# Altium PCB DB30.PcbDoc (part 1 of 8)
Units mil, origin at the board's own origin, x right, y up, seen from the top; angles counter-clockwise.
Board outline 3236.22 x 4456.69 mil, 8 copper layers (Top Layer, MidLayer1, MidLayer2, GND-Layer5, MidLayer3, VCC, MidLayer4, Bottom Layer), stack 61.8 mil thick; 219 components, 472 nets, 1811 pads, 1561 vias.
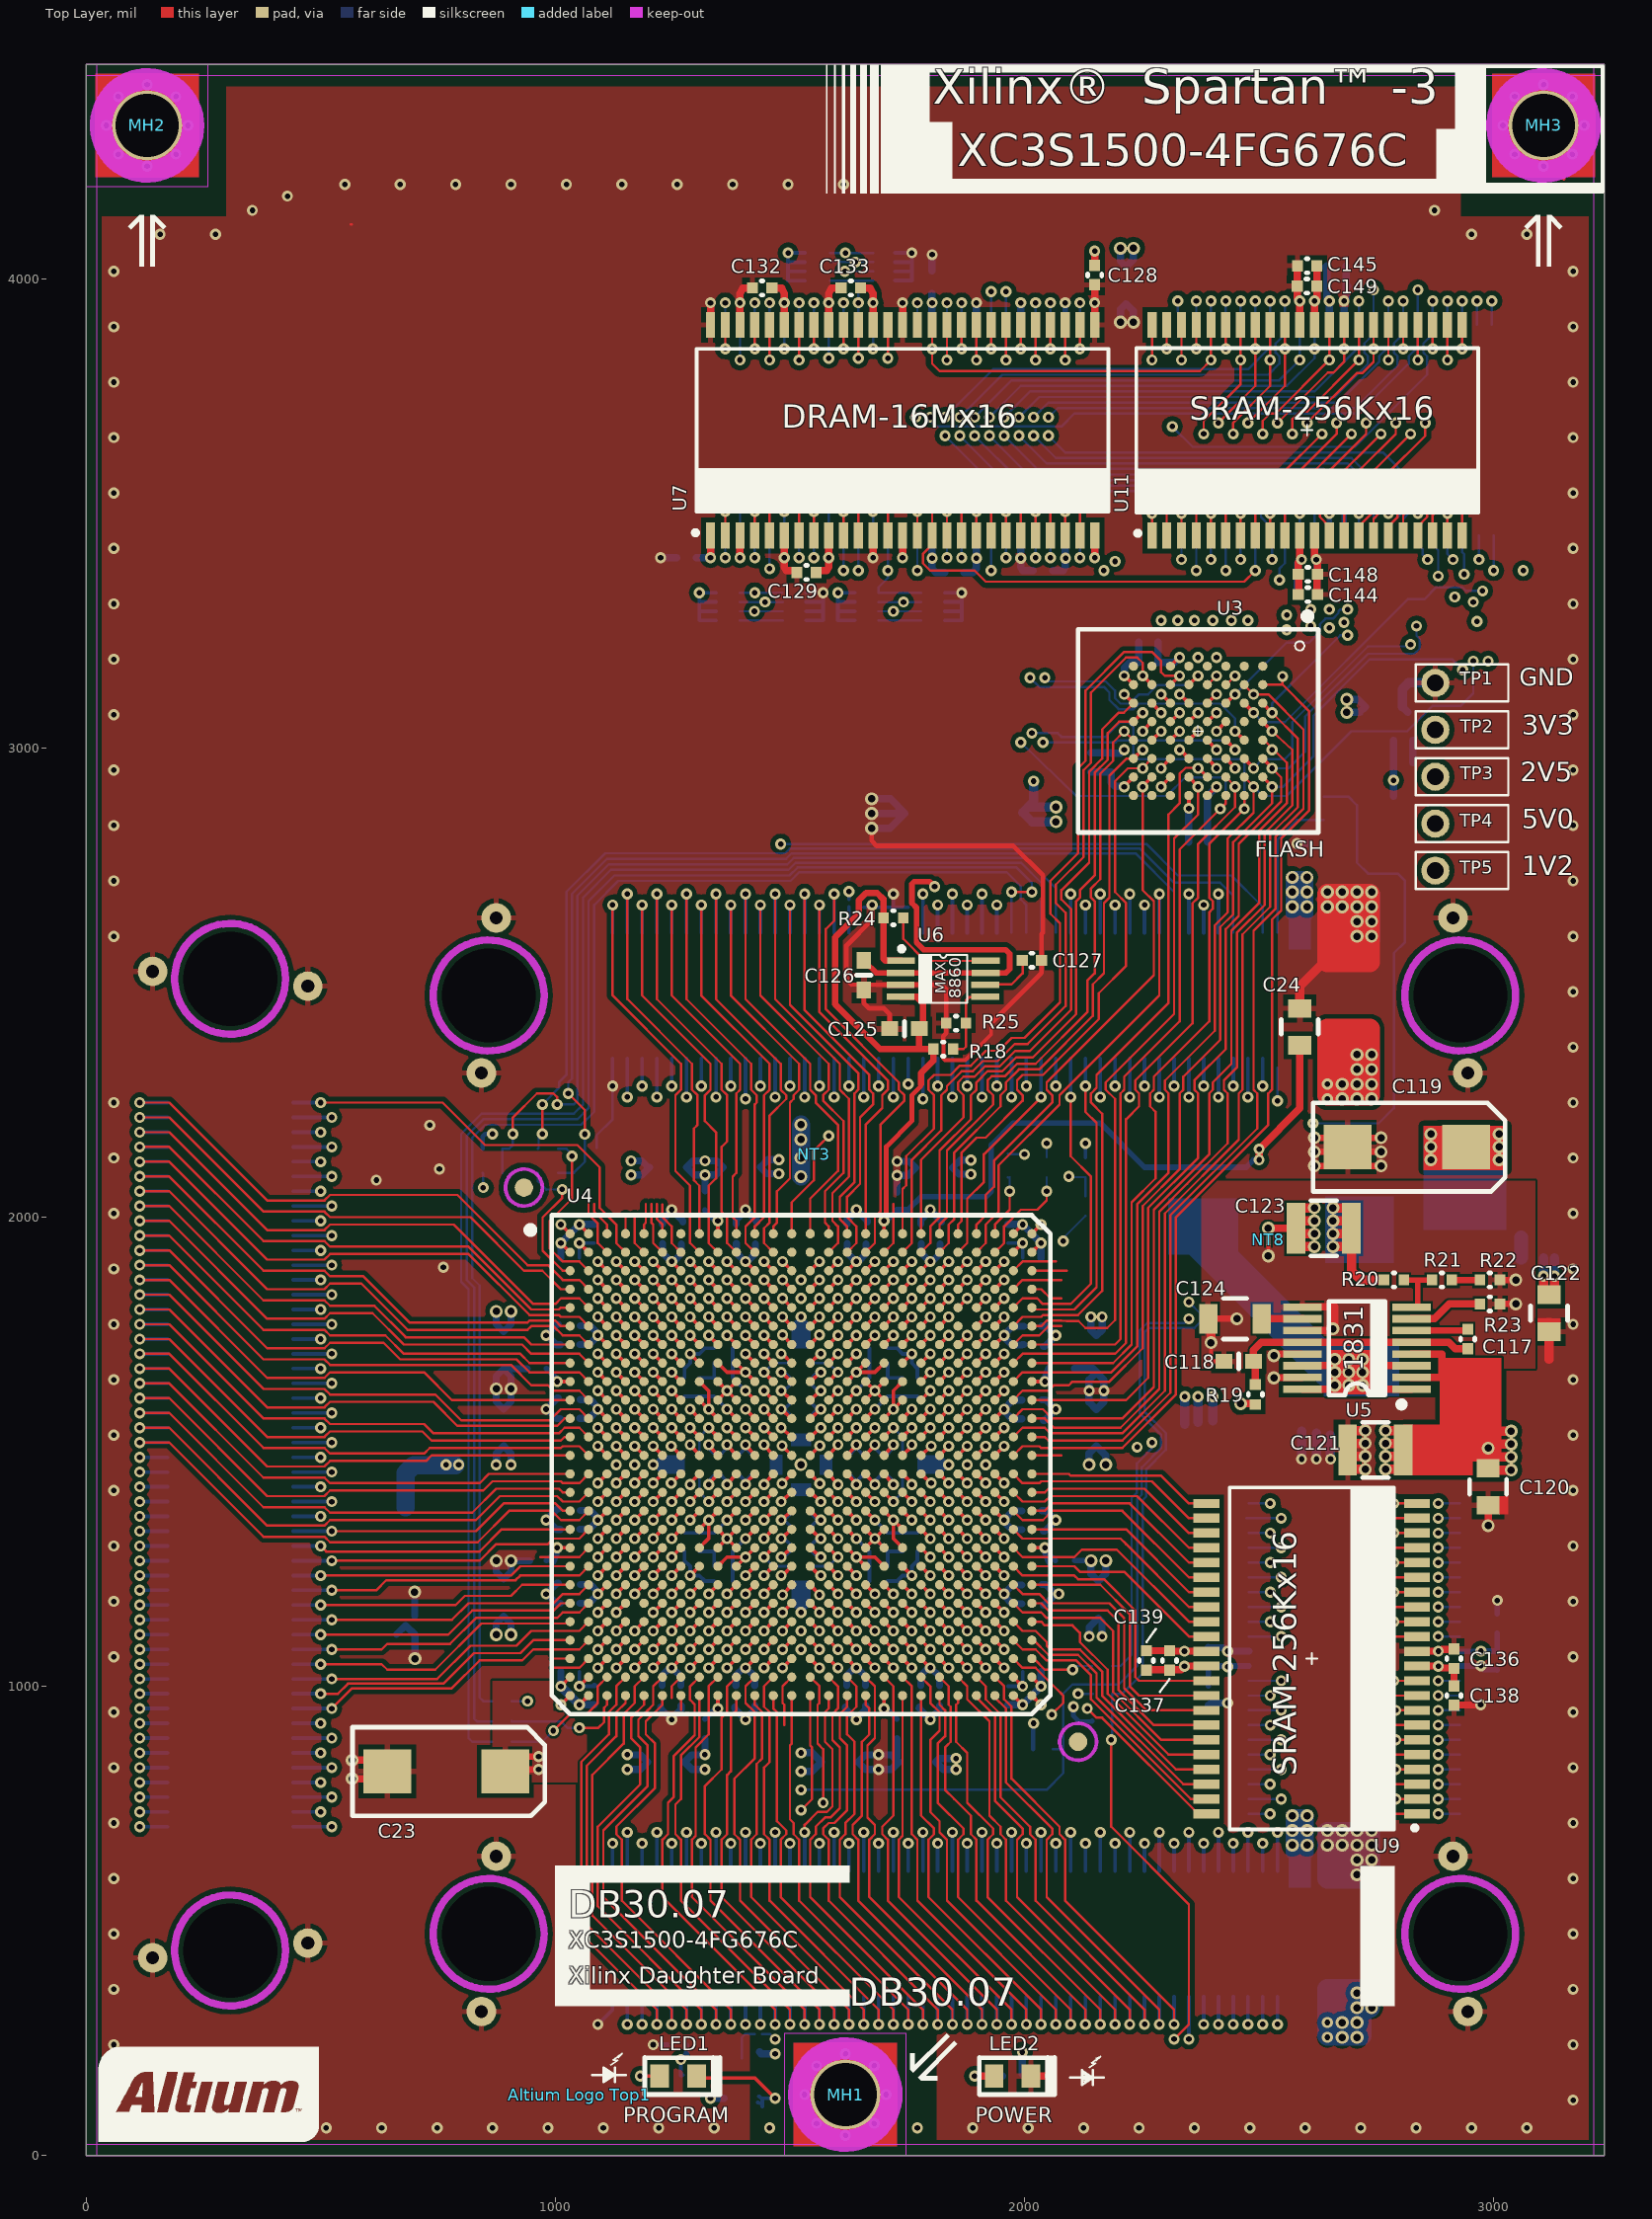
[diagram p0: Top Layer view]
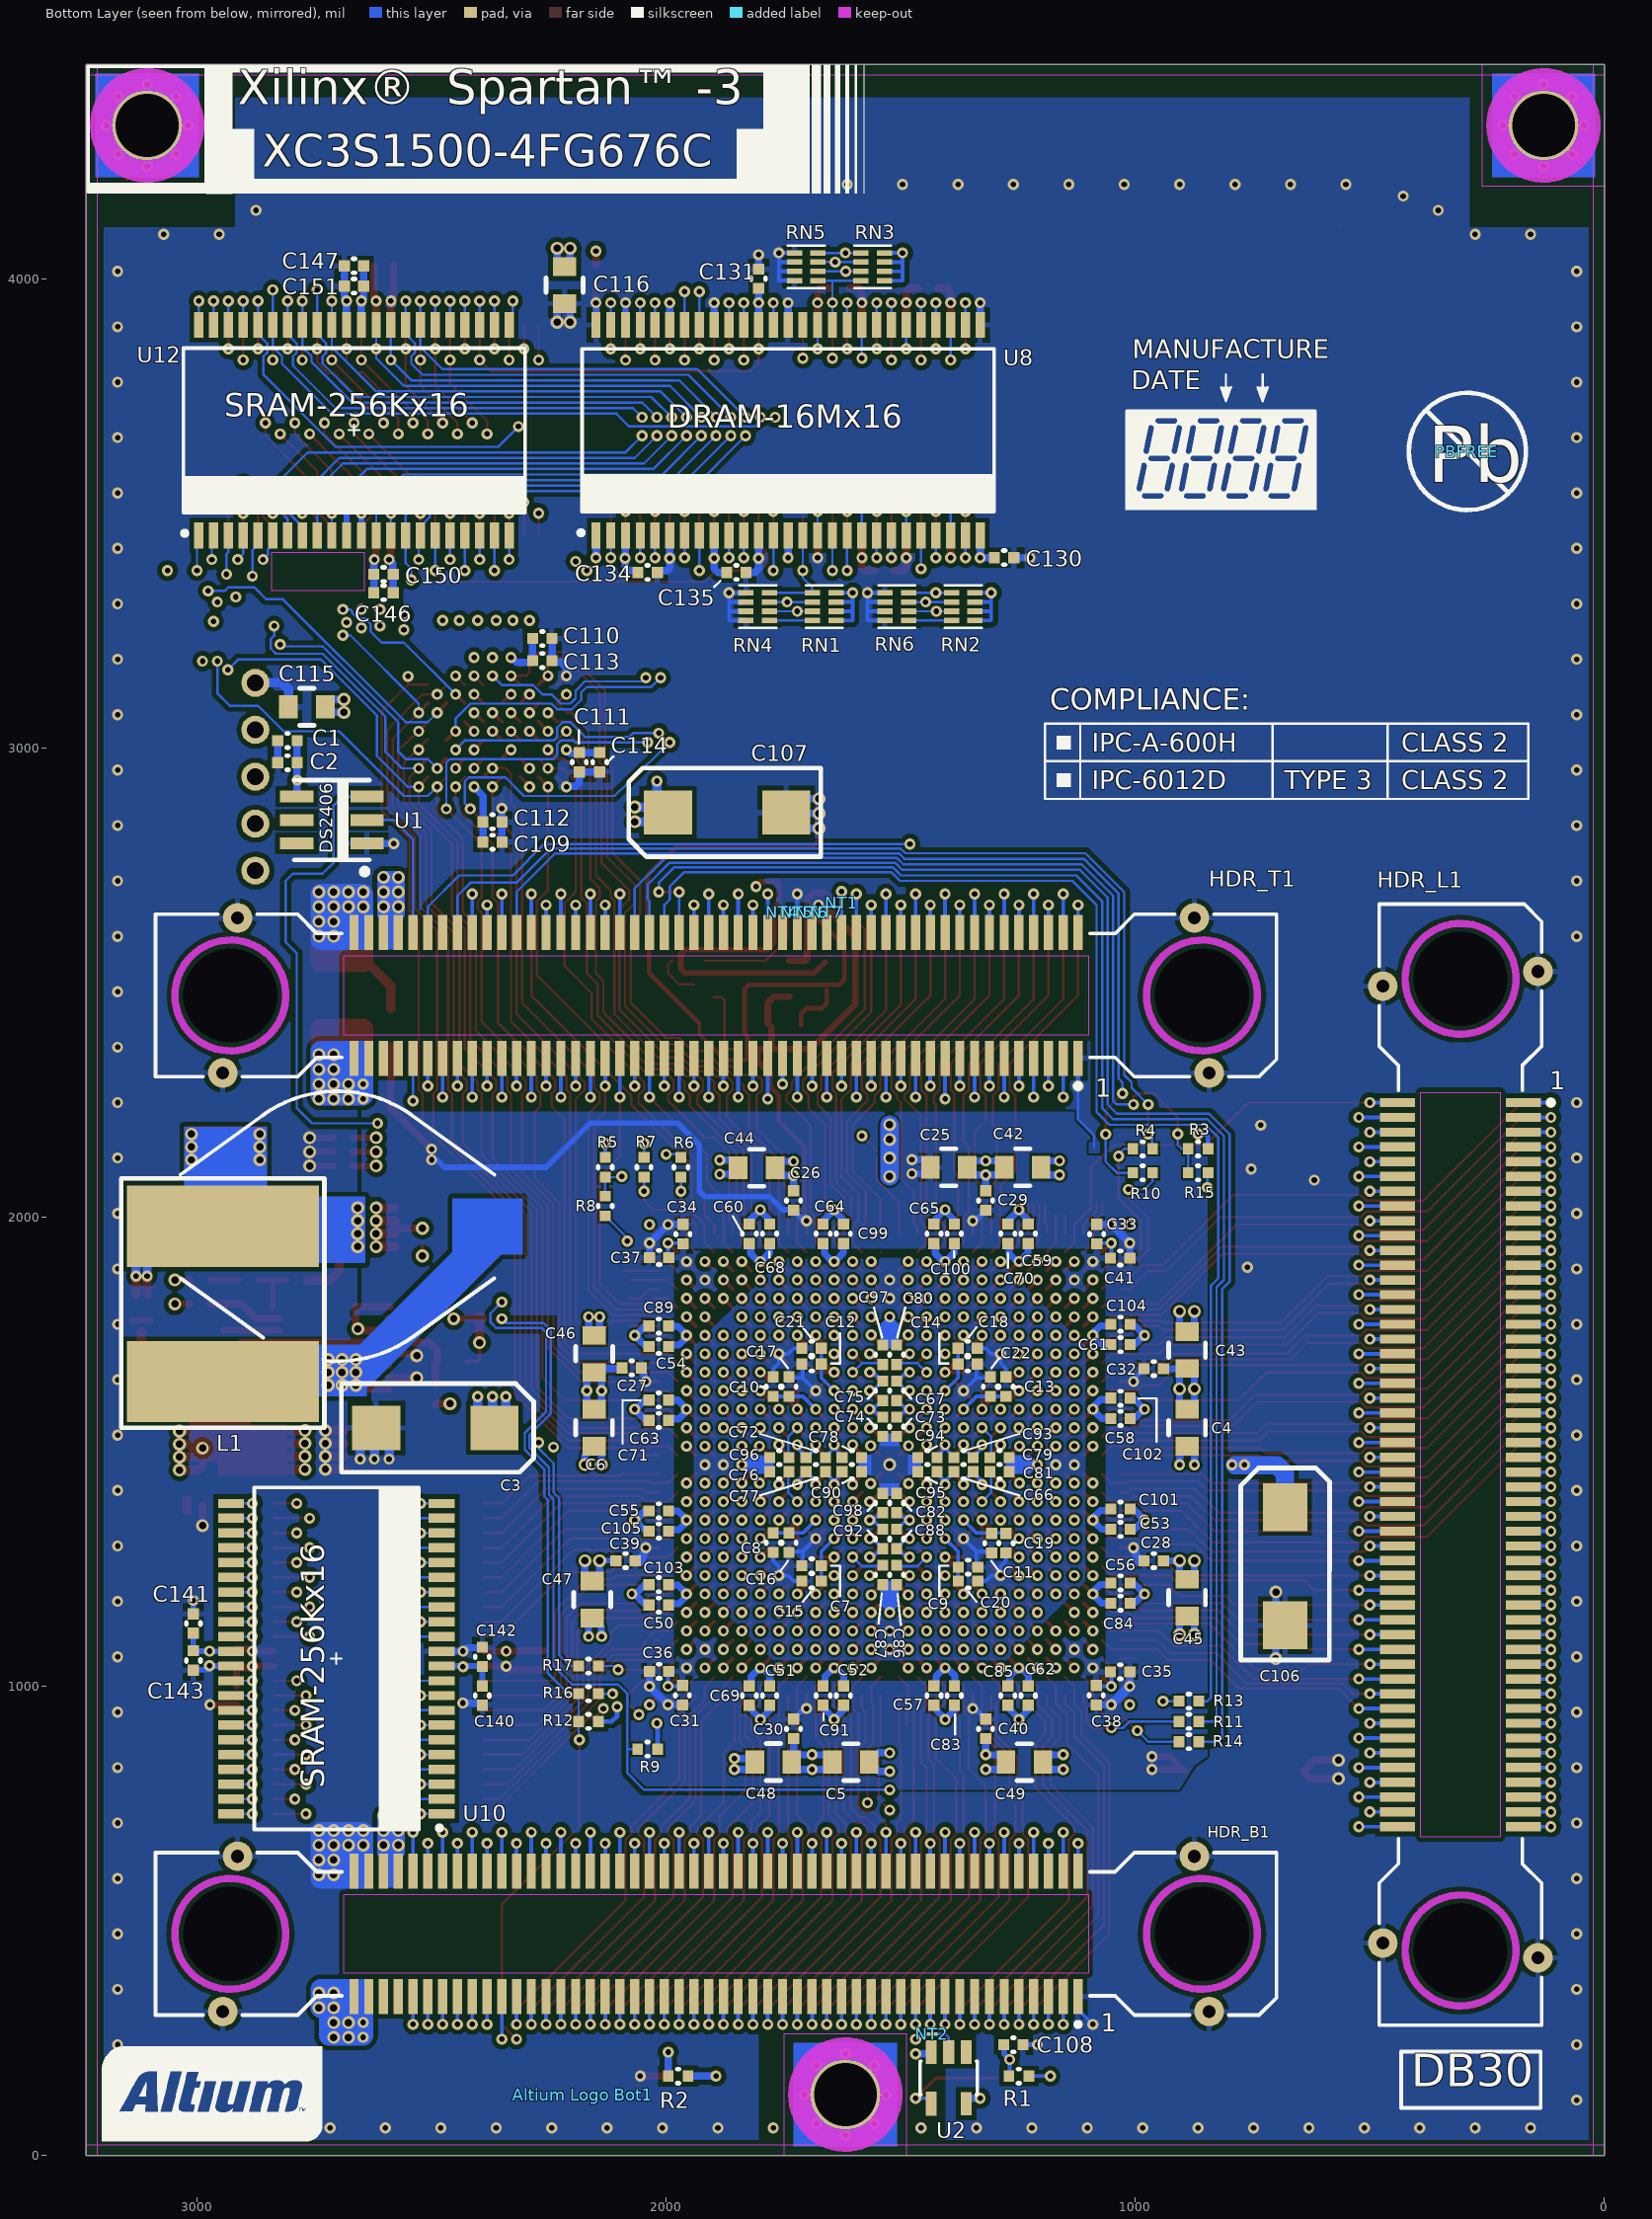
[diagram p1: Bottom Layer view, seen from below]
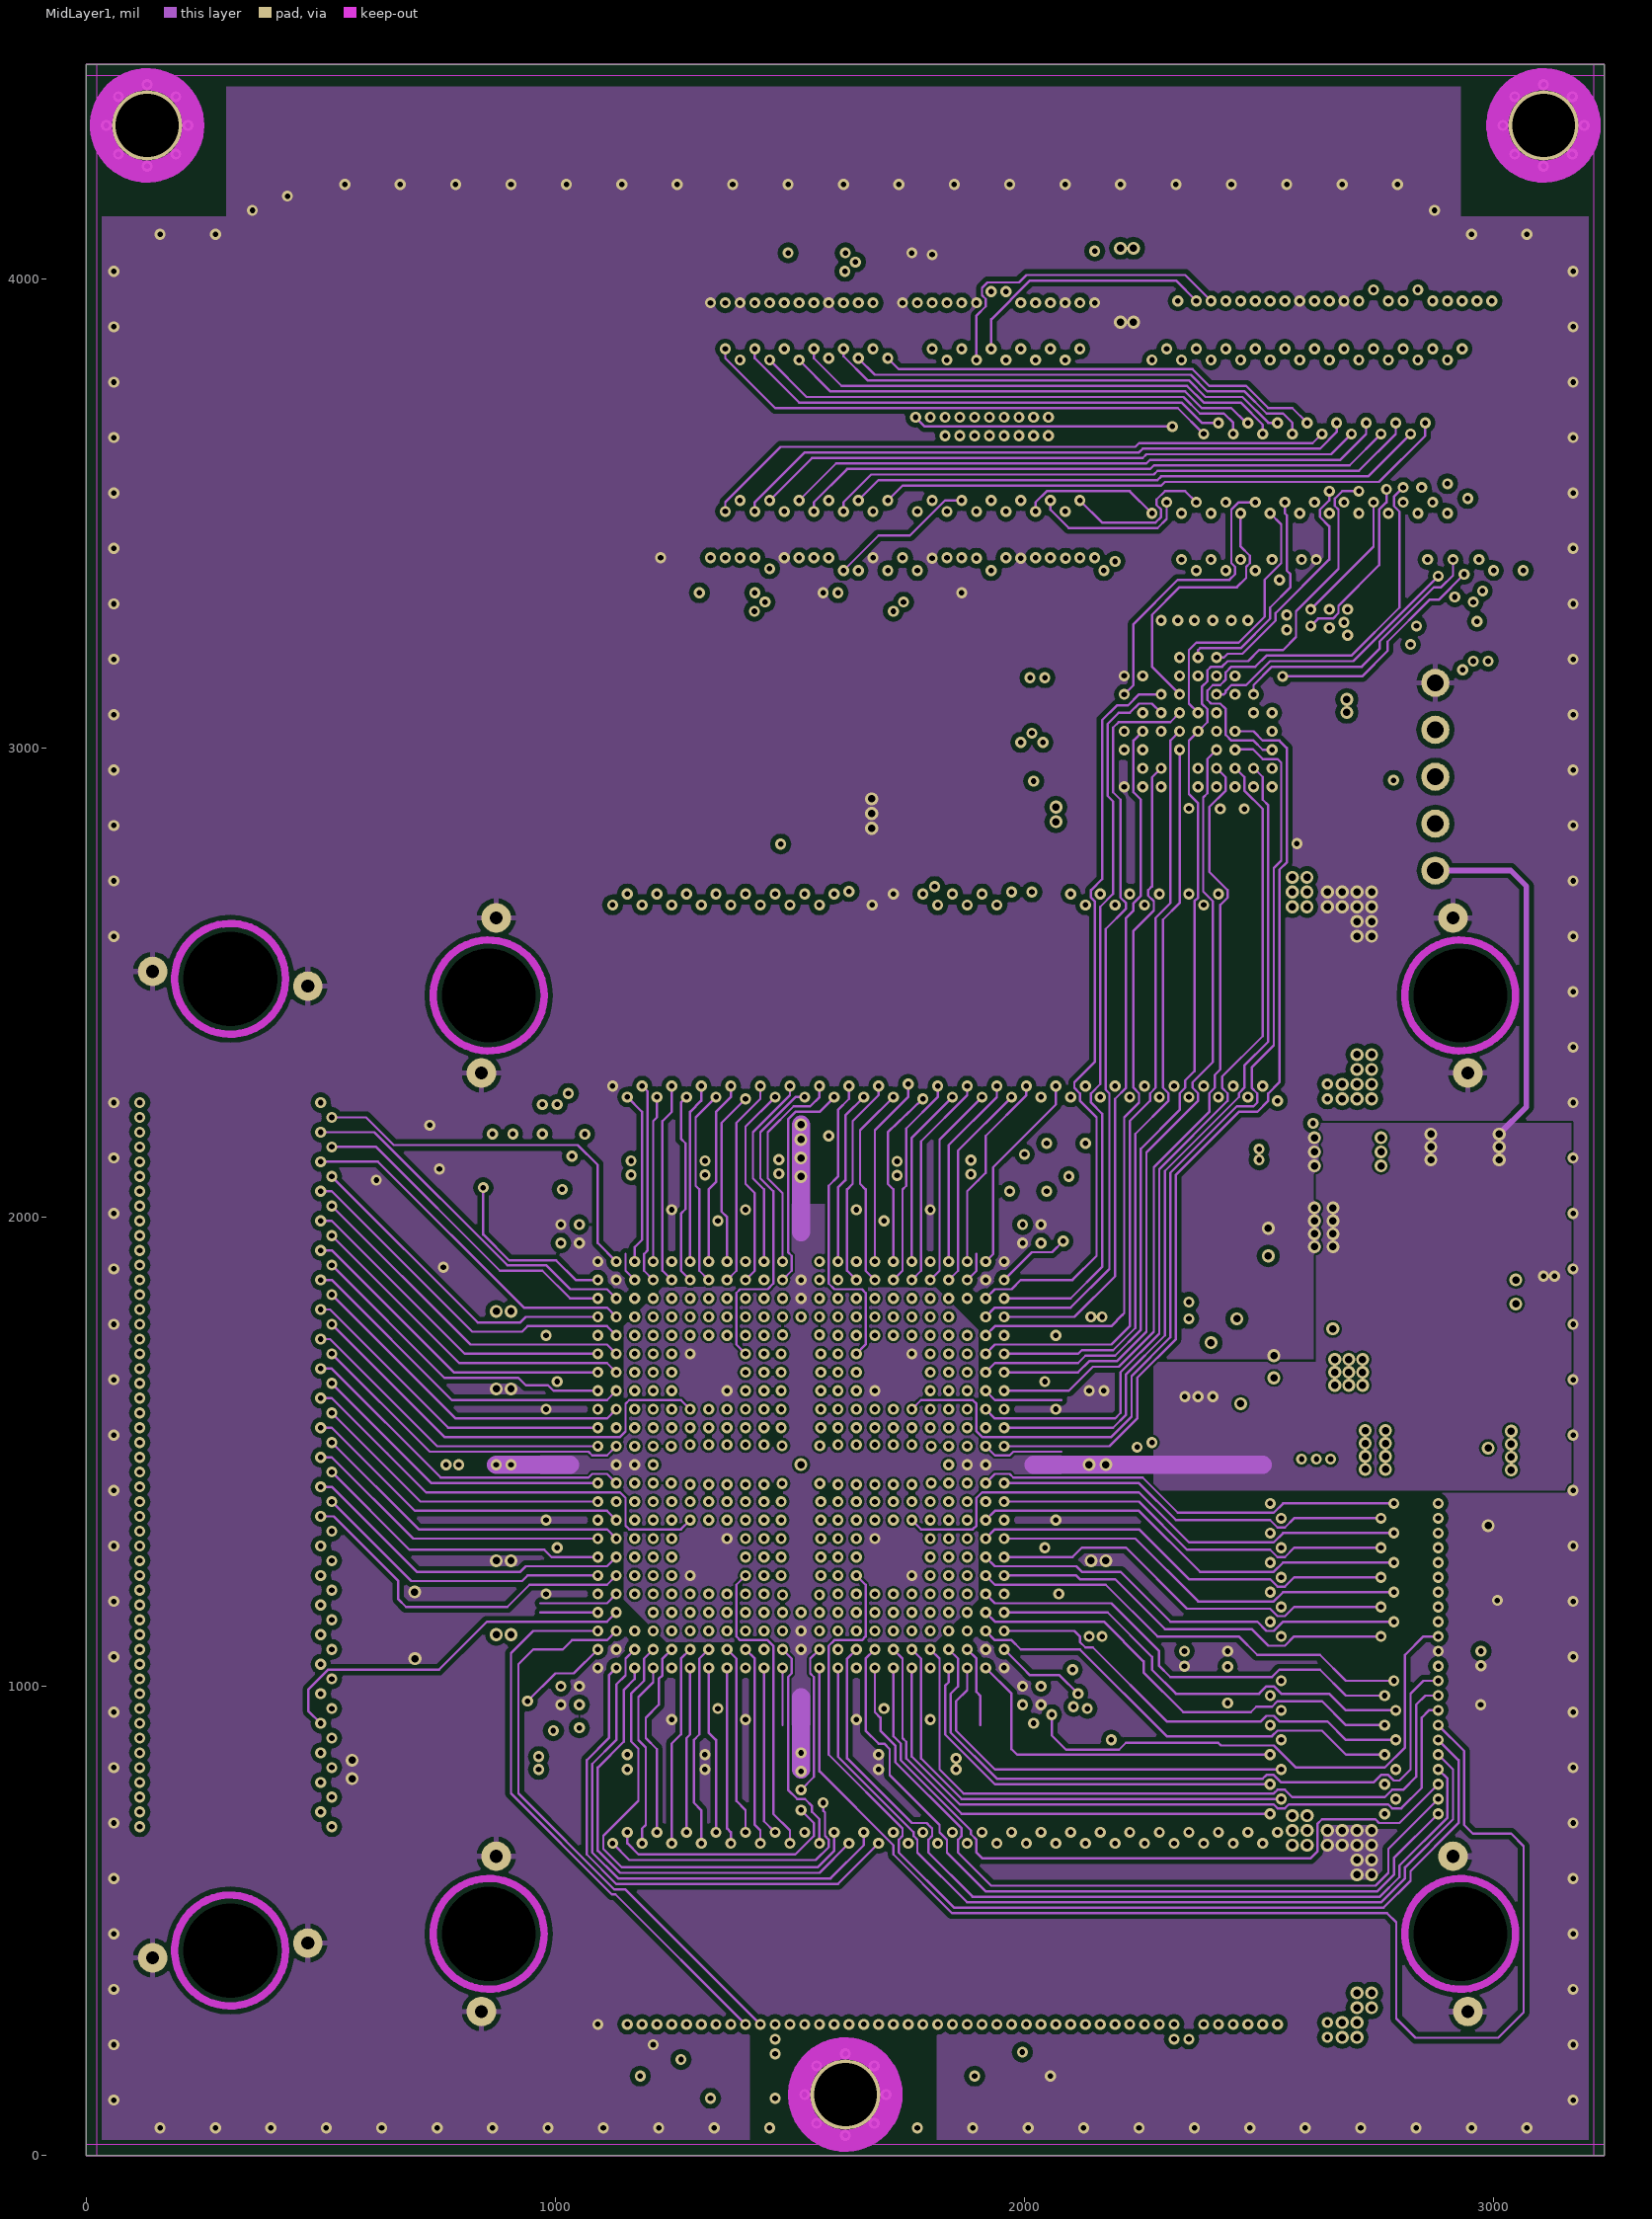
[diagram p2: MidLayer1]
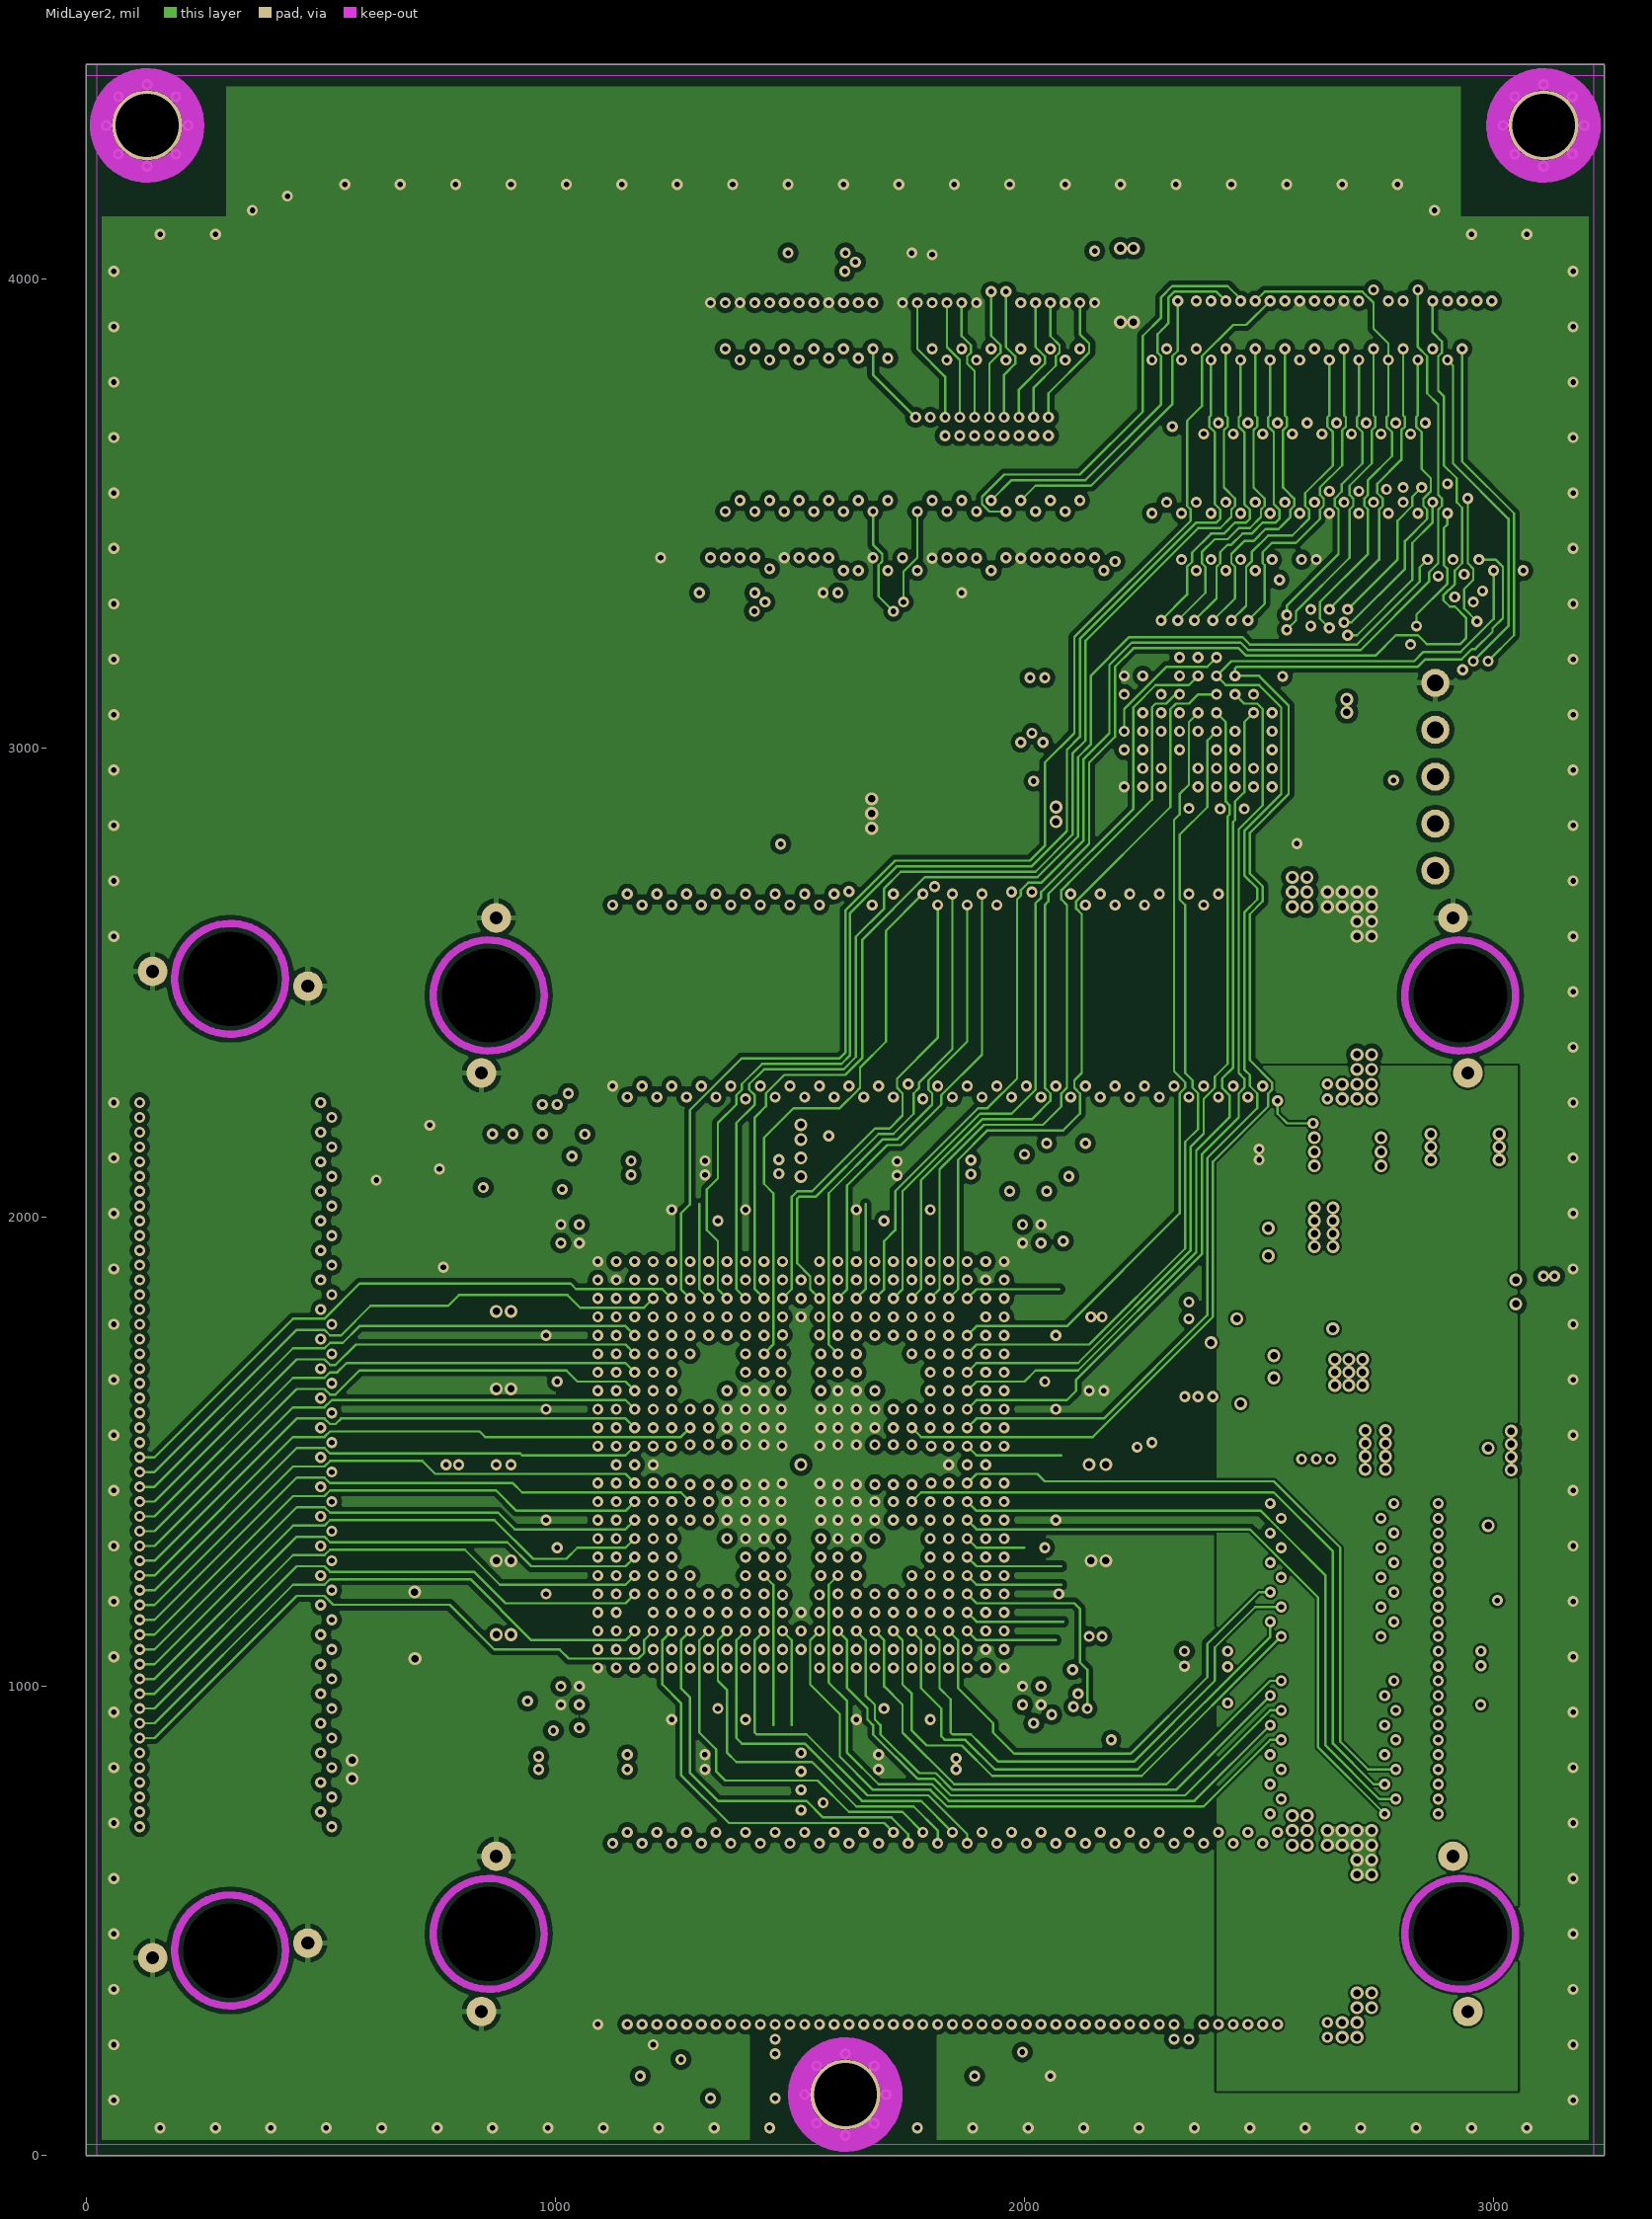
[diagram p3: MidLayer2]
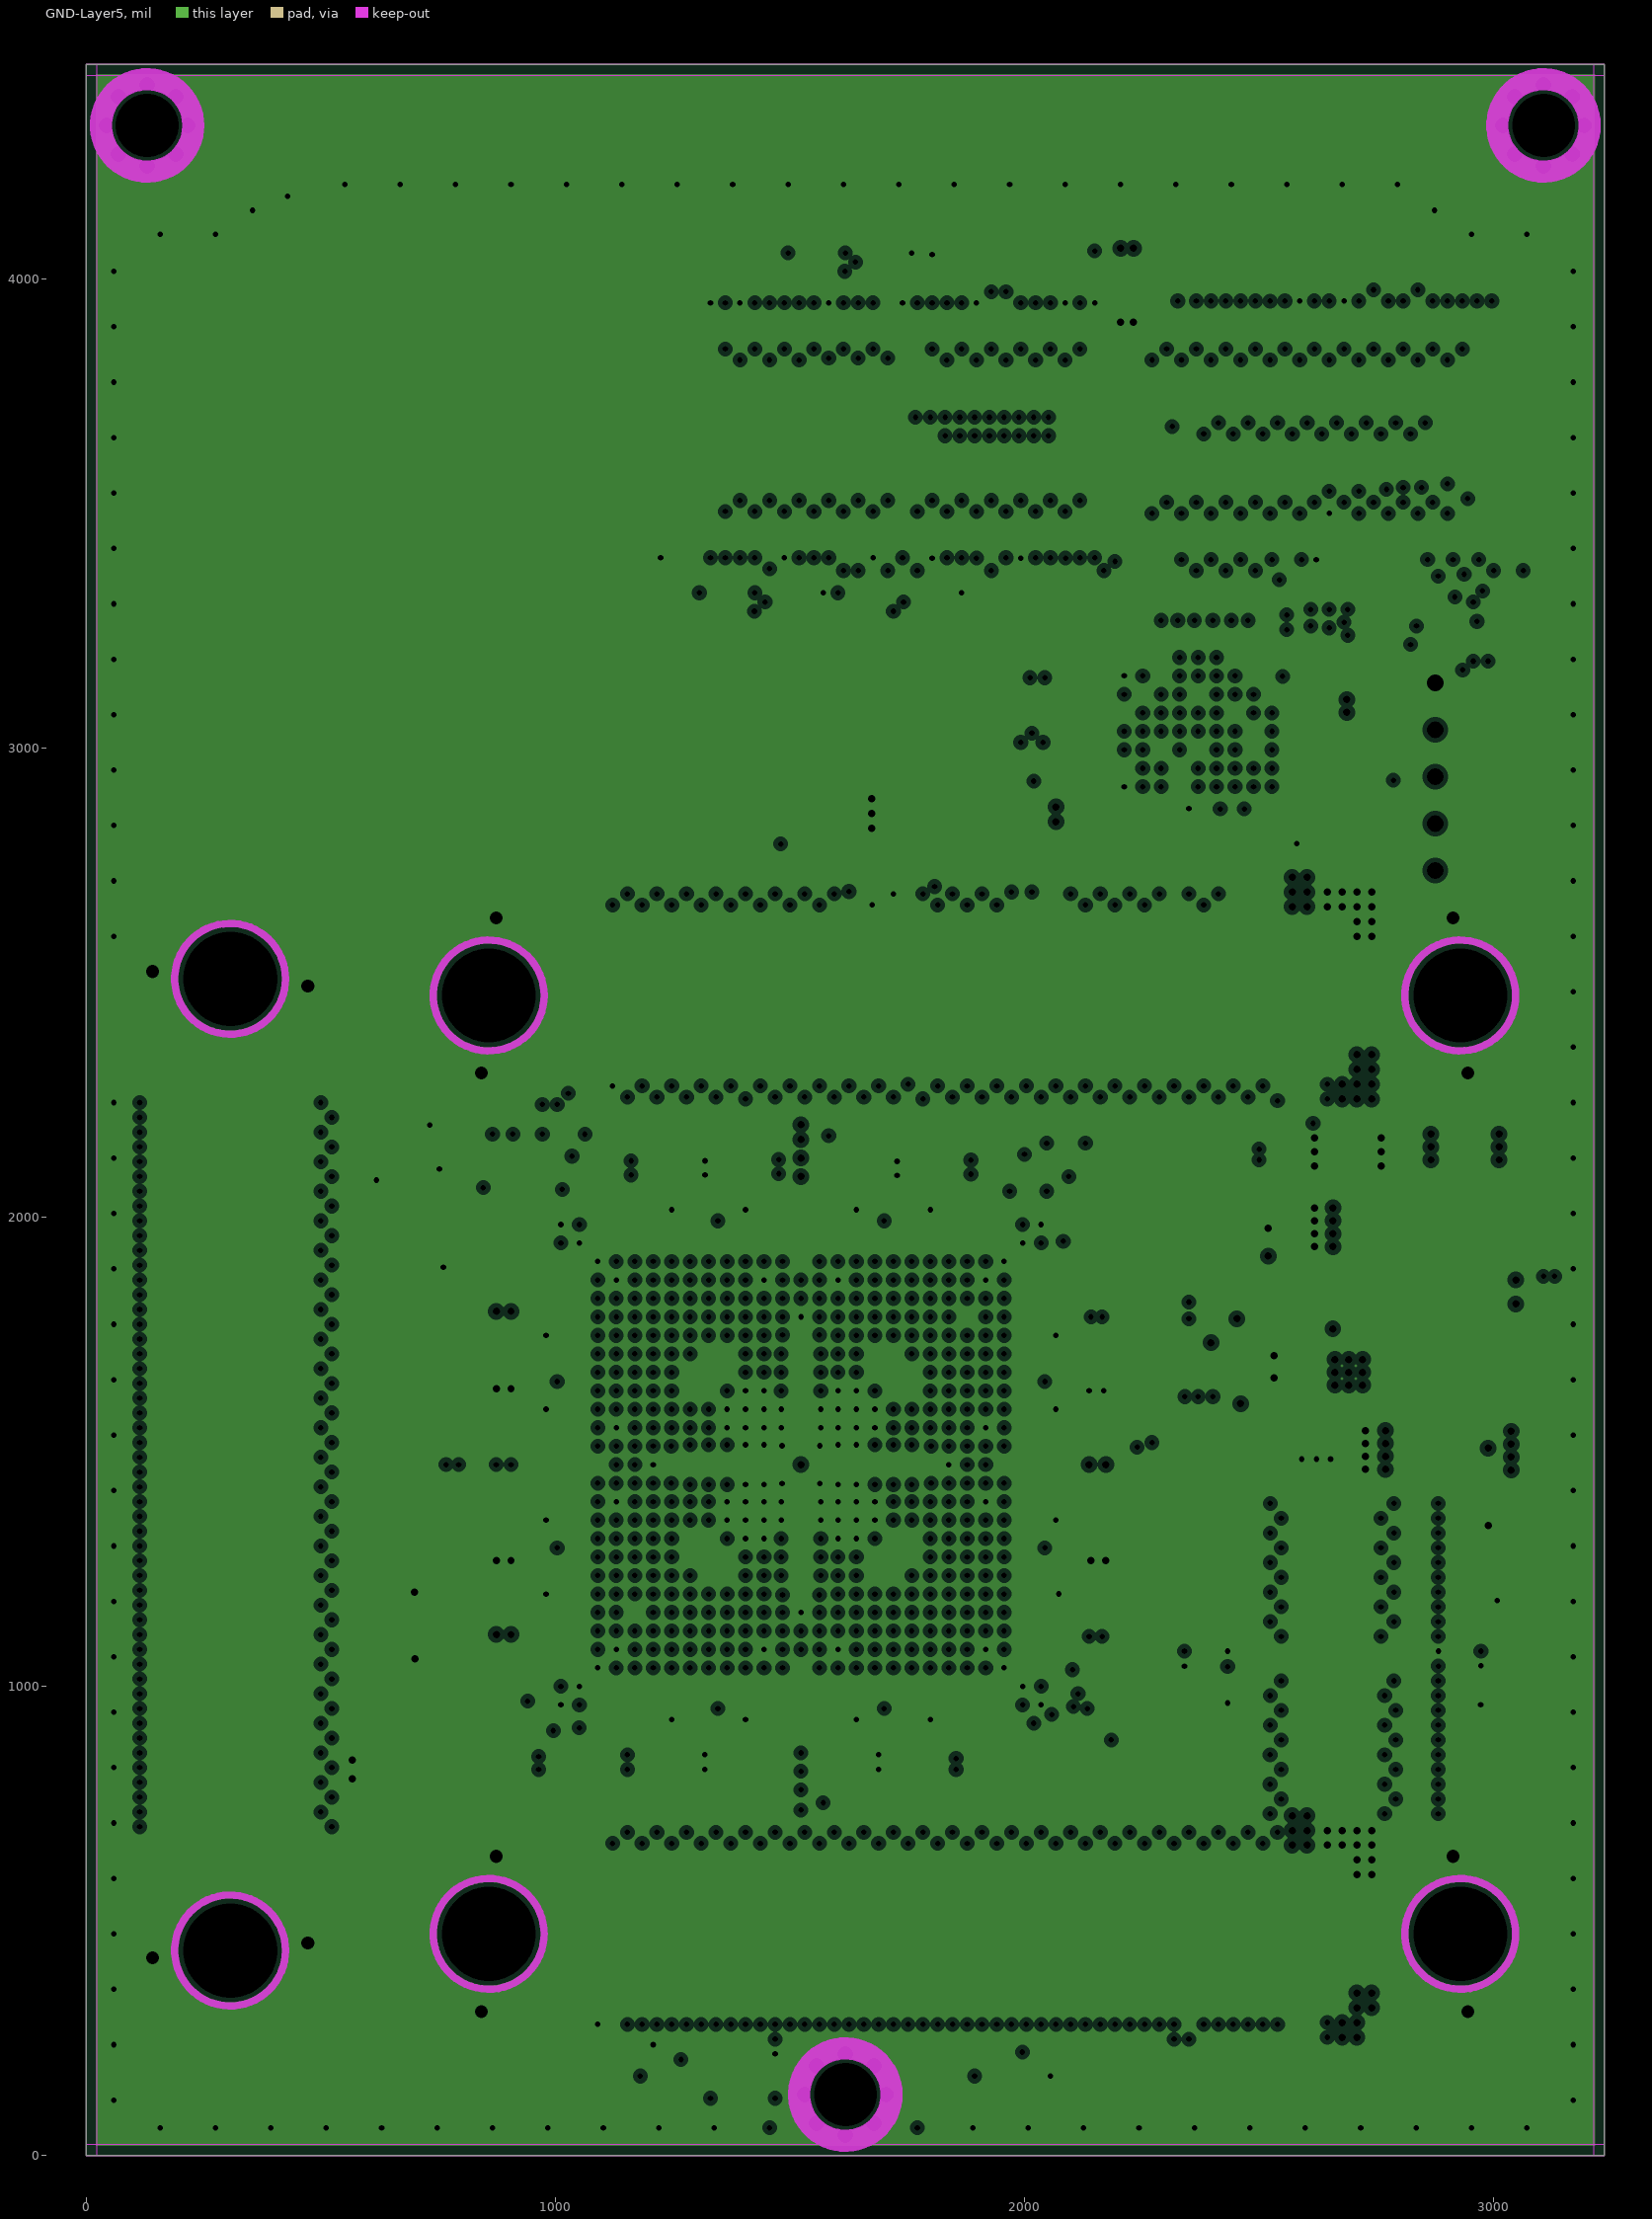
[diagram p4: GND-Layer5, clearances drawn from the general rule]
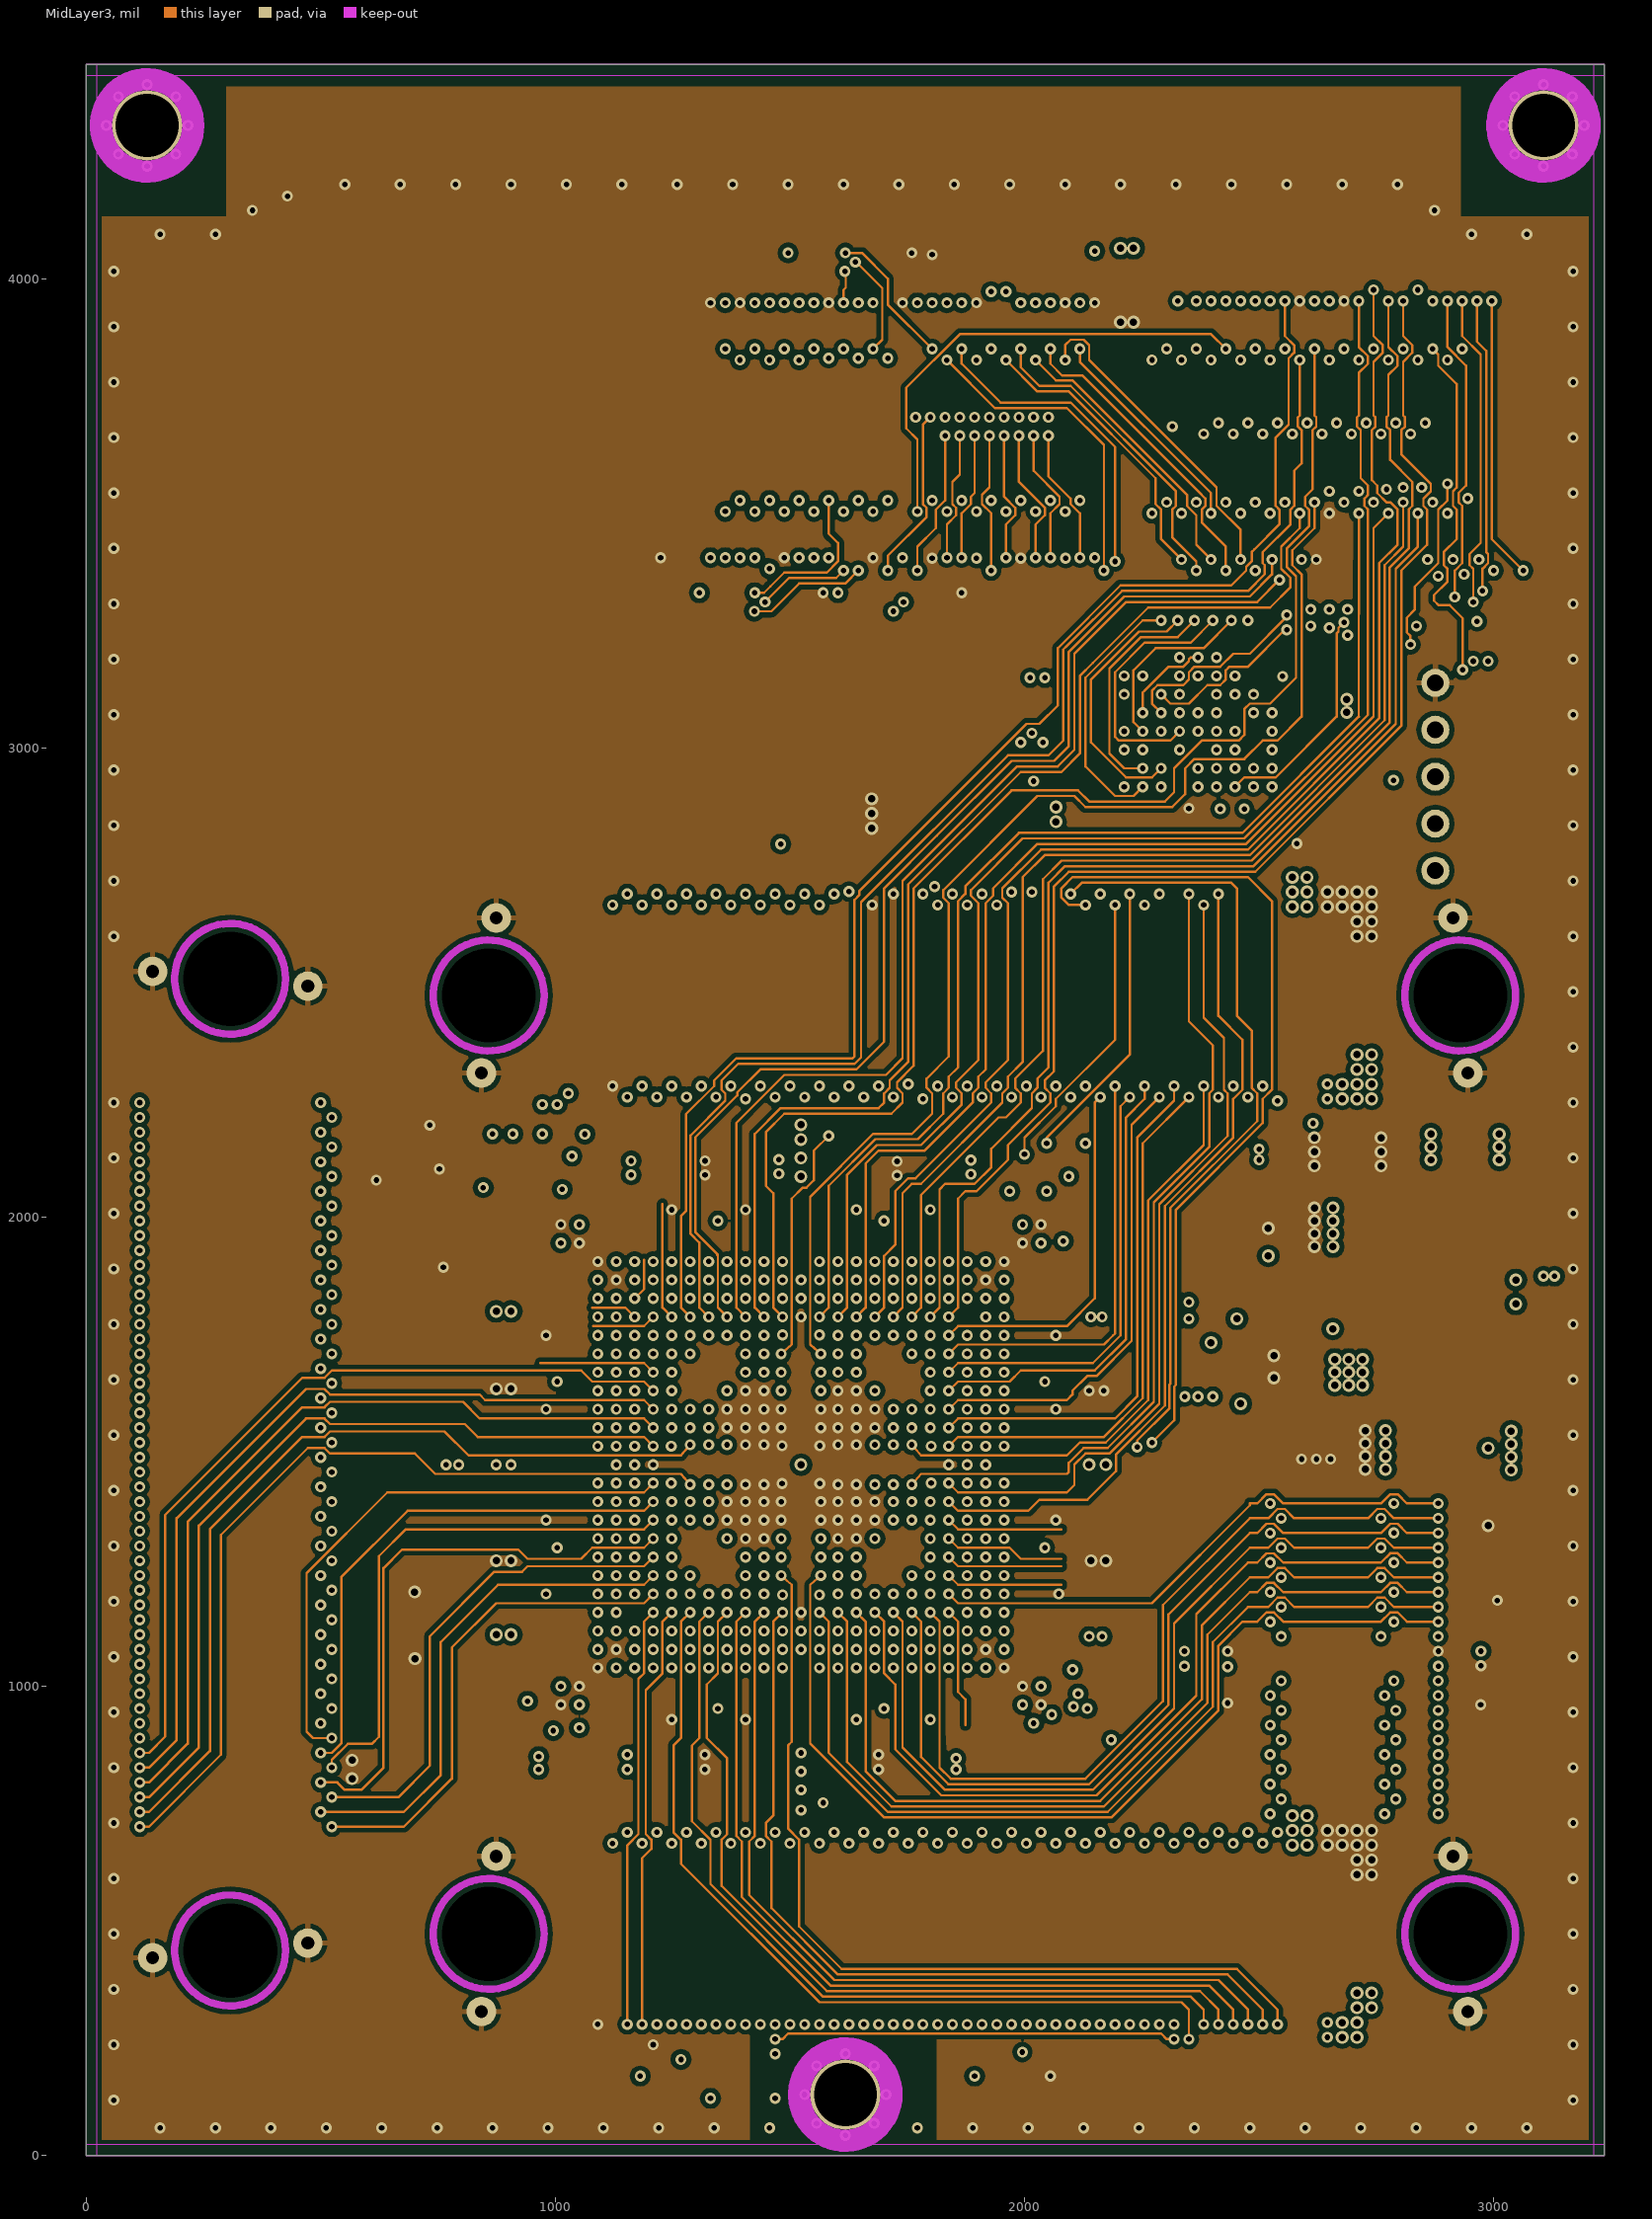
[diagram p5: MidLayer3]
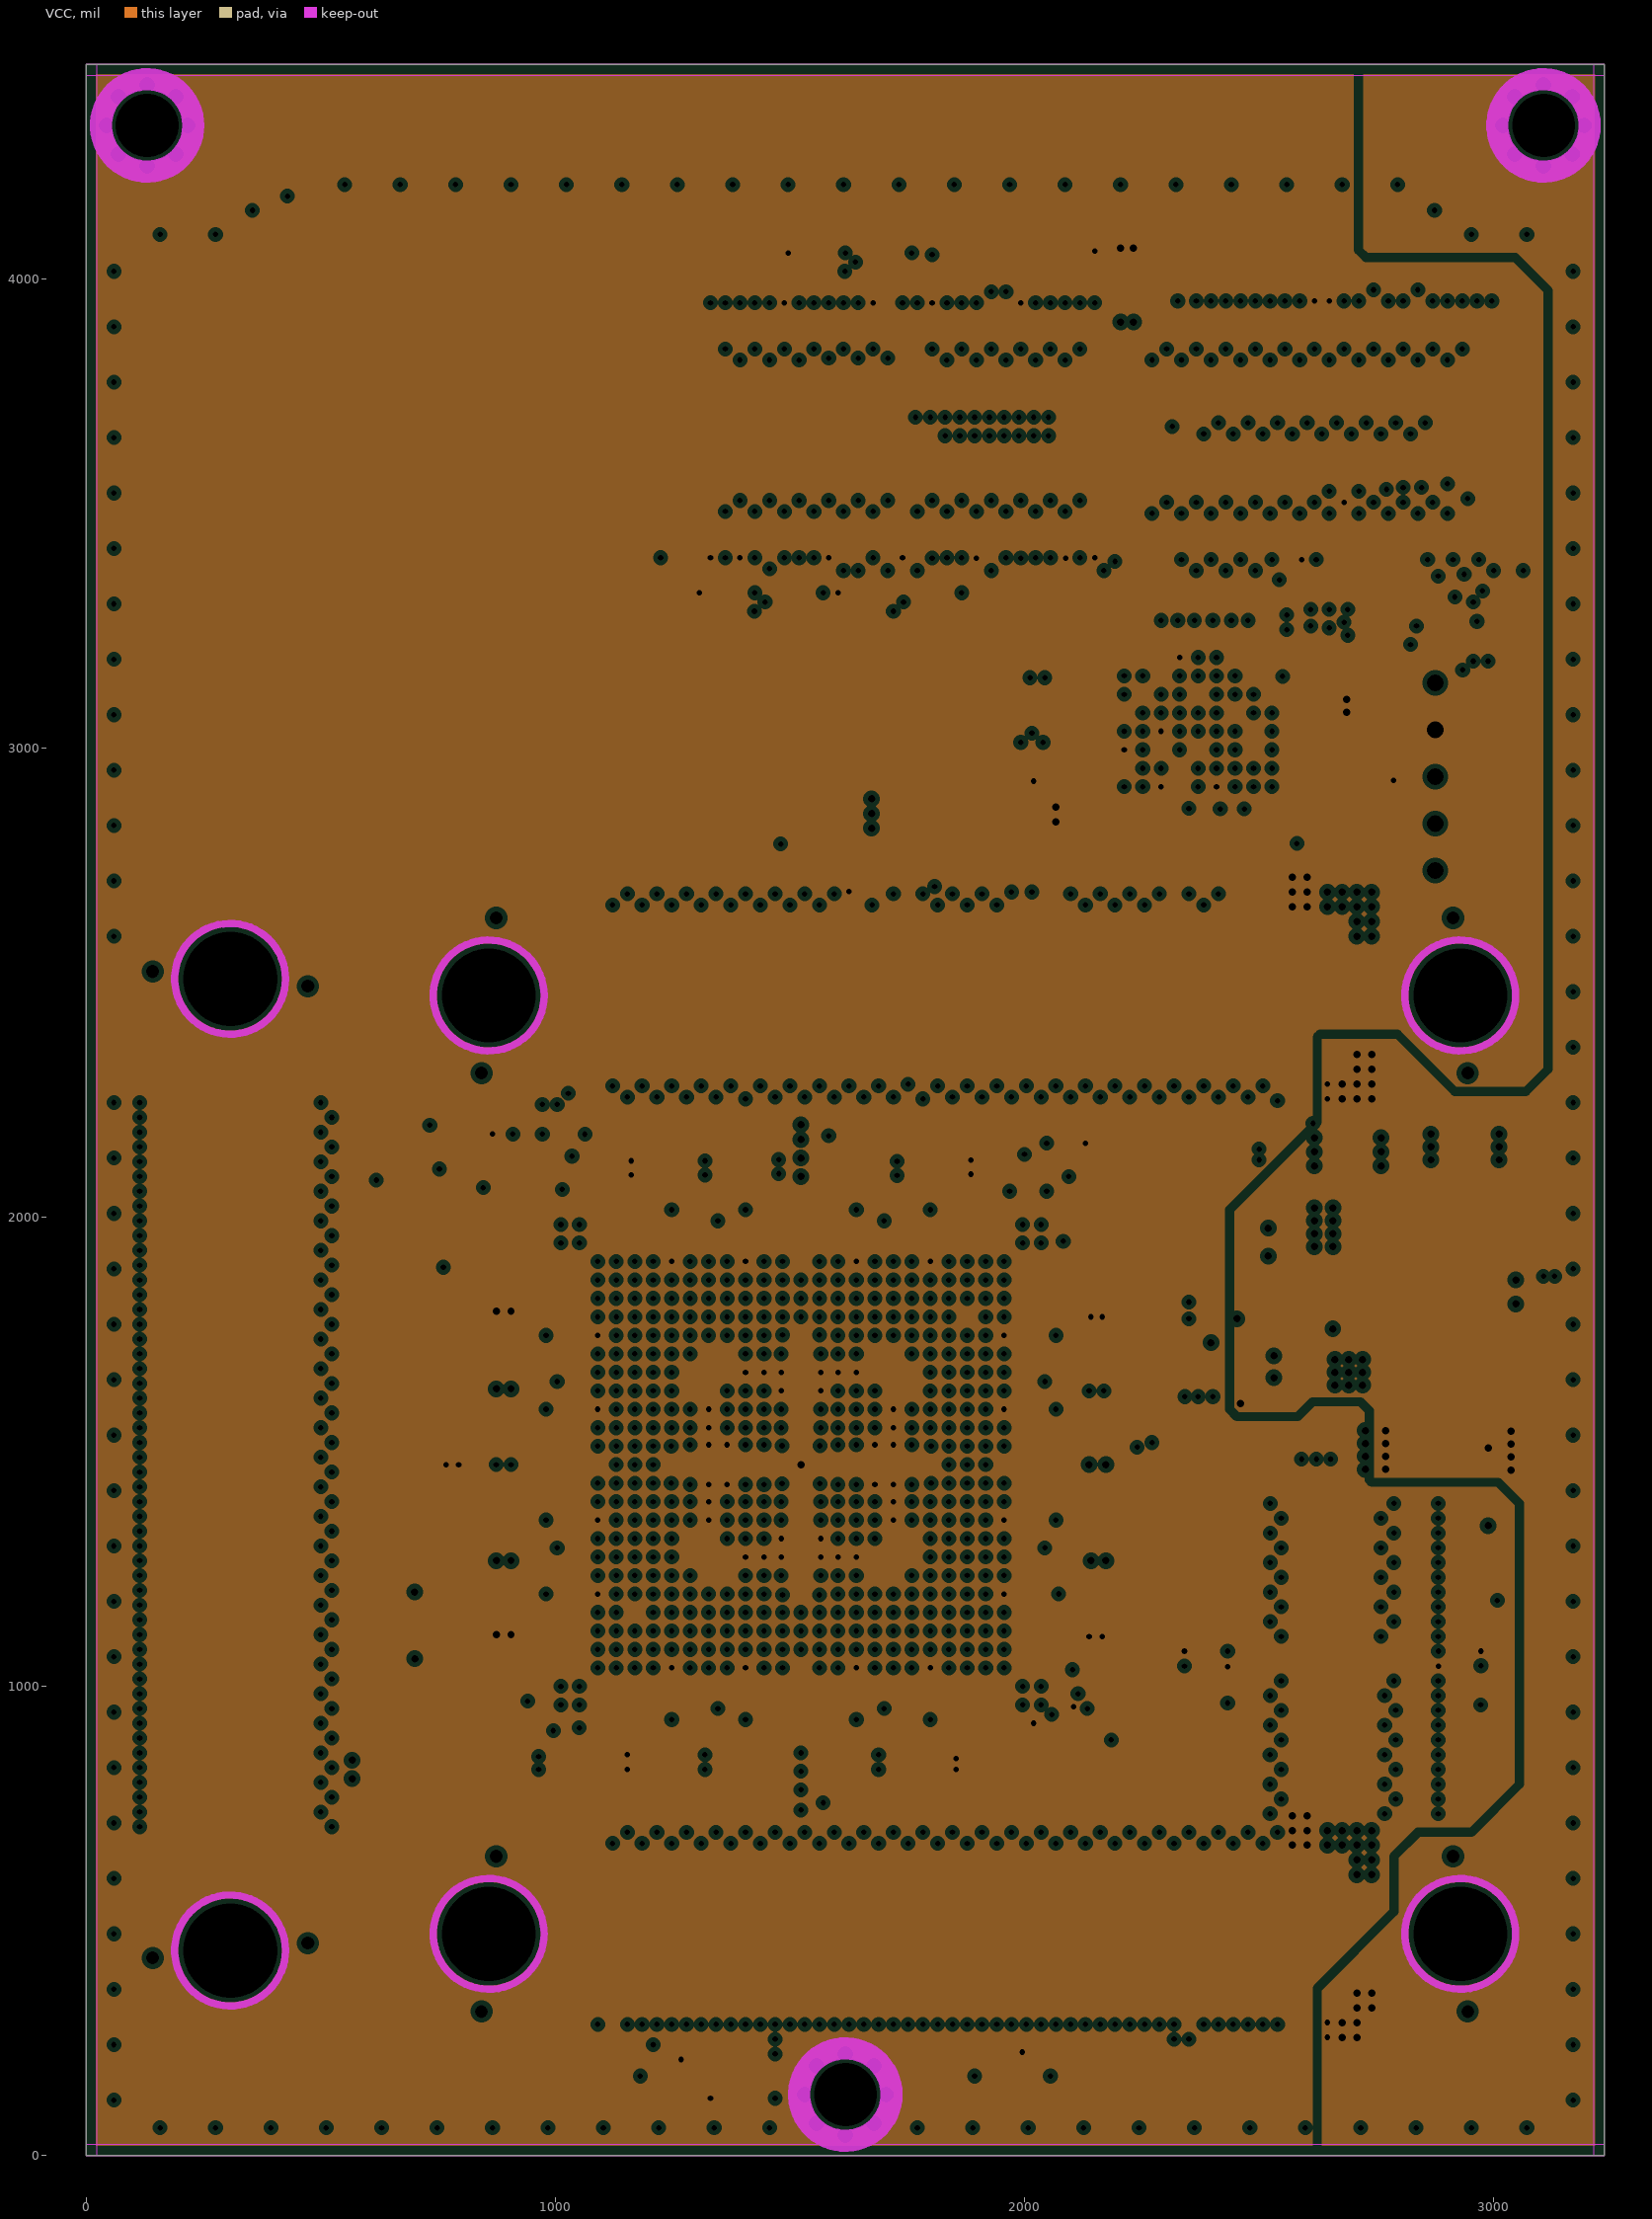
[diagram p6: VCC, clearances drawn from the general rule]
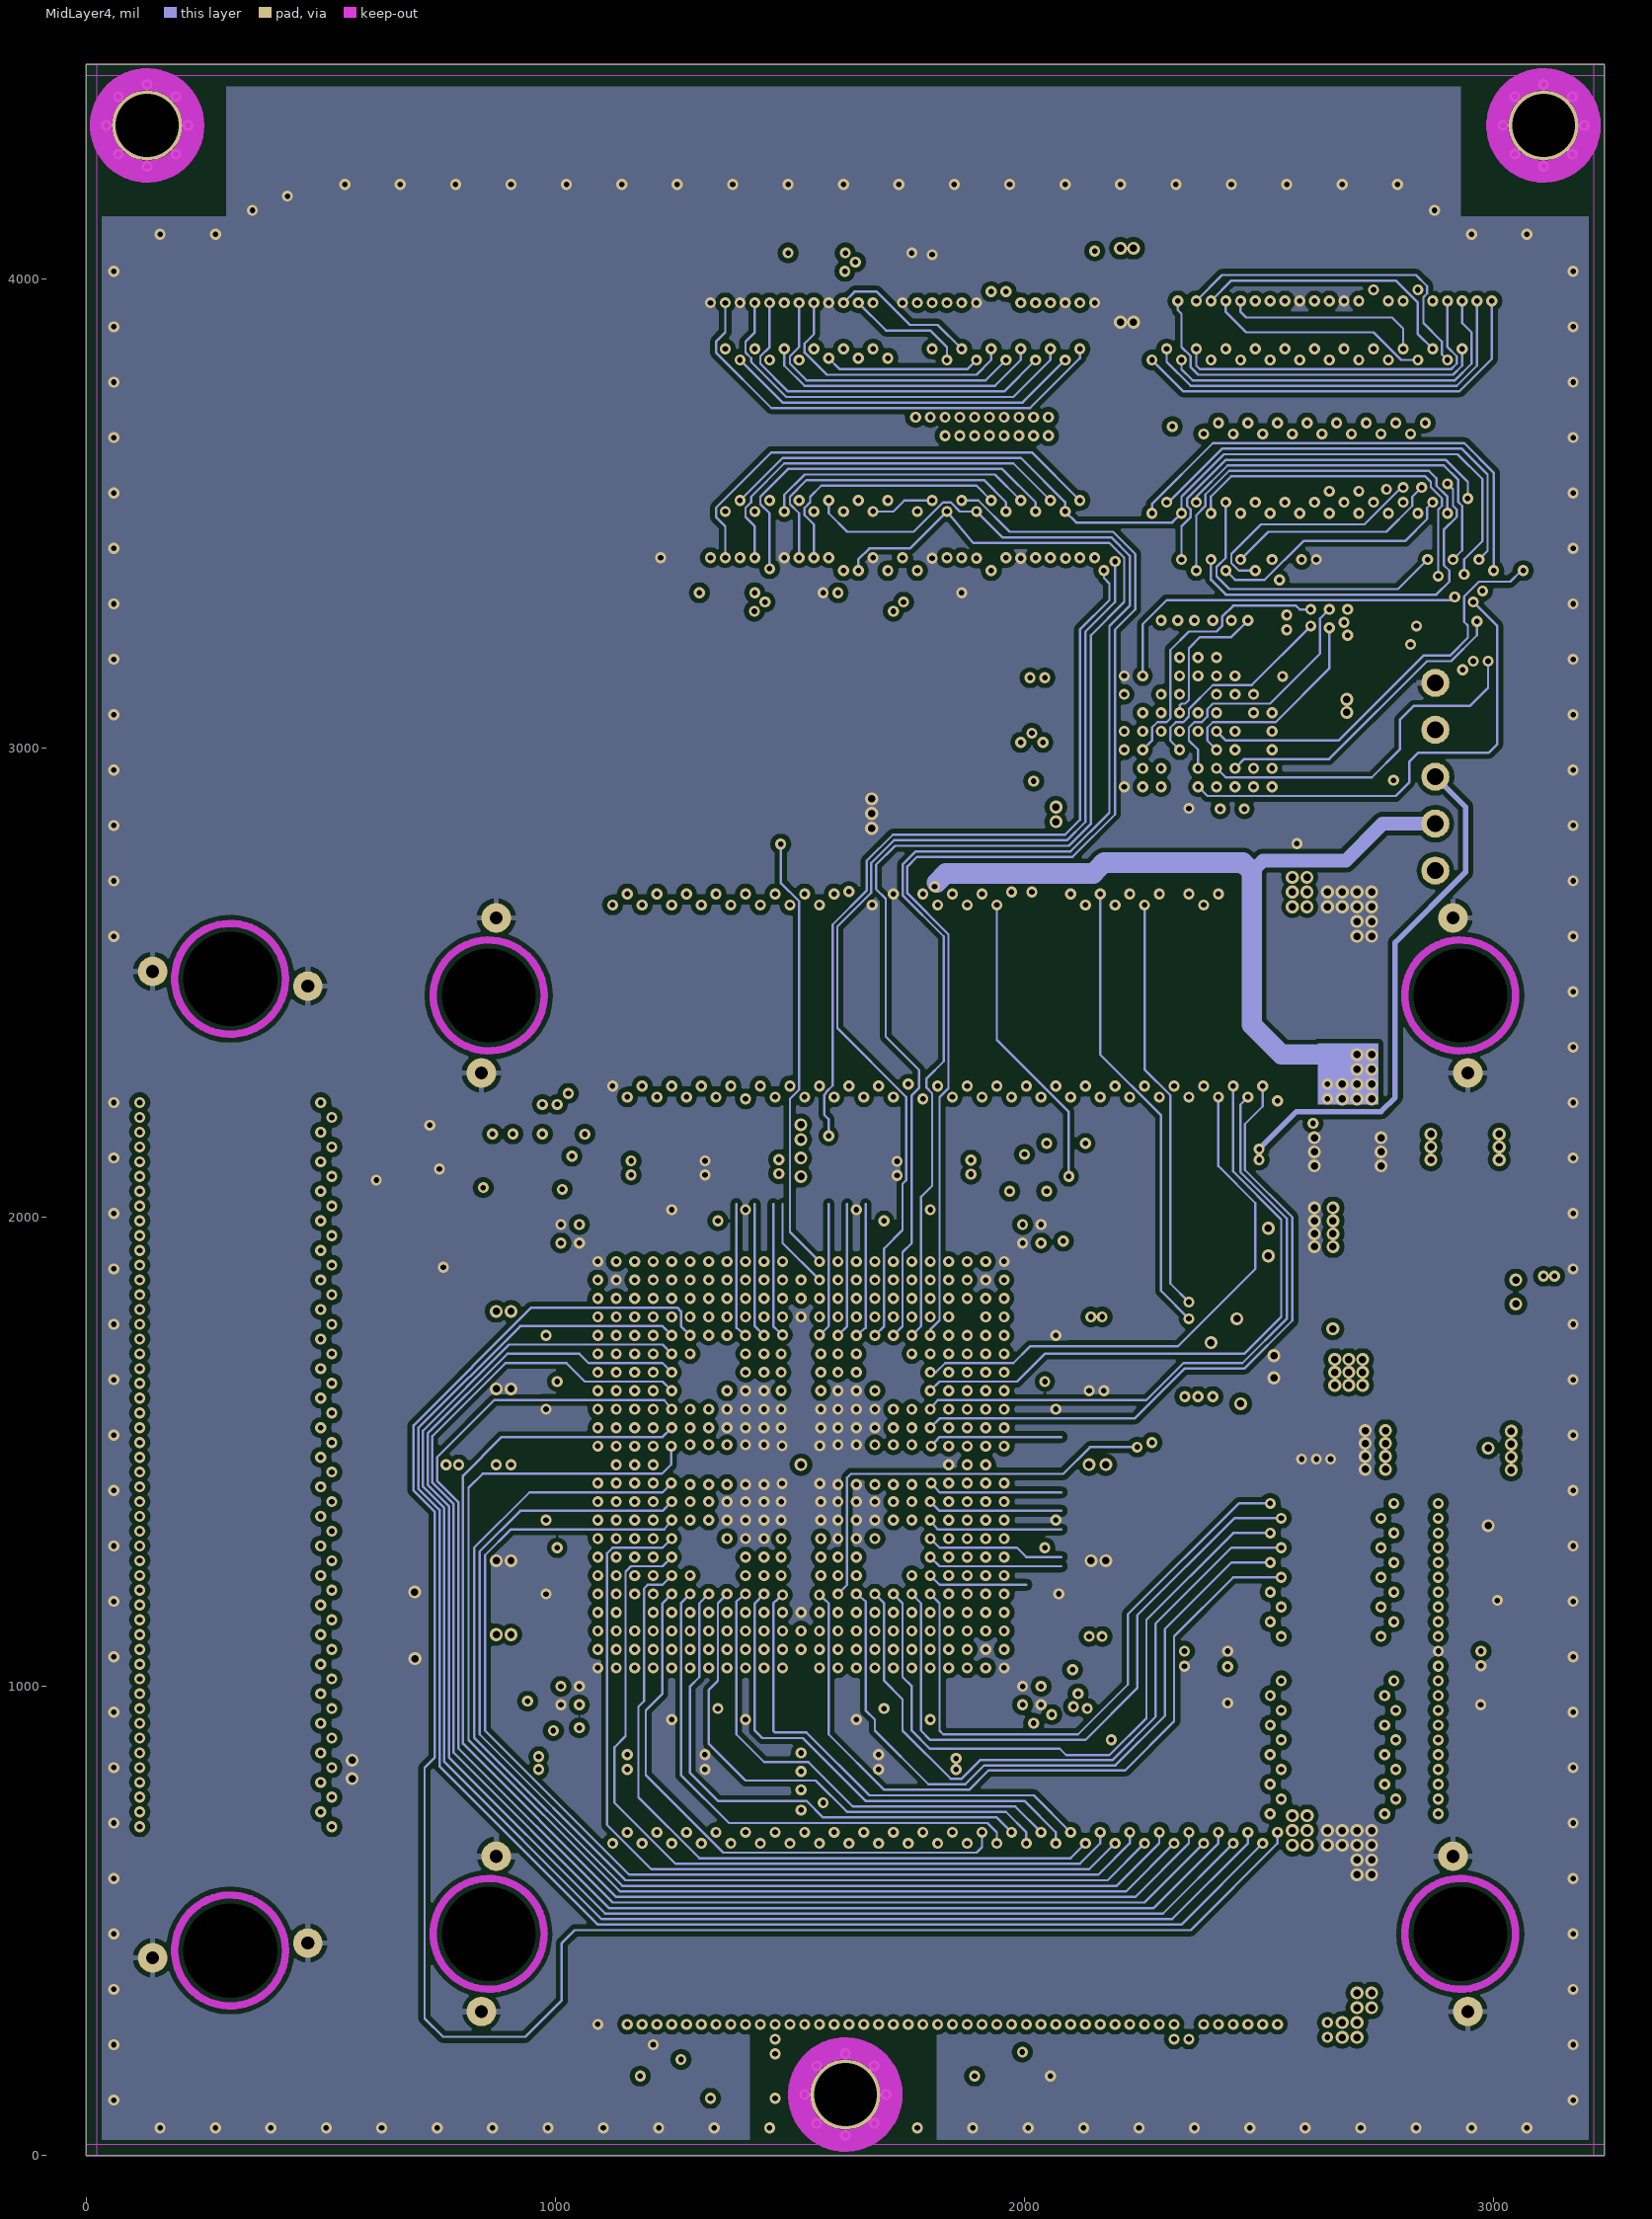
[diagram p7: MidLayer4]

## Layer stack, top to bottom
Top Layer: signal copper 1.7
Dielectric: prepreg 5, FR-4, Dk 4.2
MidLayer1: signal copper 1.4
Dielectric: core 10, FR-4, Dk 4.2
MidLayer2: signal copper 1.4
Dielectric: prepreg 5, FR-4, Dk 4.2
GND-Layer5: plane copper 1.4, net GND
Dielectric: core 10, FR-4, Dk 4.2
MidLayer3: signal copper 1.4
Dielectric: prepreg 5, FR-4, Dk 4.2
VCC: plane copper 1.4, net (Multiple Nets)
Dielectric: core 10, FR-4, Dk 4.2
MidLayer4: signal copper 1.4
Dielectric: prepreg 5, FR-4, Dk 4.2
Bottom Layer: signal copper 1.7

## Board outline
0,0 0,4456.69 1523.62,4456.69 3236.22,4456.69 3236.22,0

## Design rules (kind name [scope] priority, off if disabled: settings)
Clearance Clearance_Poly_Tight [InNamedPolygon('FPGAPWR-BL-1V2') Or InNamedPolygon('FPGAPWR-BL-3V3') Or InNamedPolygon('FPGAPWR-BL-2V5A') Or InNamedPolygon('FPGAPWR-BL-2V5B') Or InNamedPolygon('FPGAPWR-BL-2V5C') Or InNamedPolygon('FPGAPWR-BL-2V5D') Or InNamedPolygon('FPGAPWR-ML1-1V2') Or InNamedPolygon('FPGAPWR-BL-2V5E') Or InNamedPolygon('1V2-CONNECT-TO-L1-C17' ) Or InNamedPolygon('2V5') Or InNamedPolygon('LX') Or InNamedPolygon('2V5-TOP-CAP') Or InNamedPolygon('AGND-TOP')] p1: gap=5
Clearance Clearance_Polygon [InPolygon] p2: gap=10
Clearance "Pad-Pad Clearance" [IsPad vs IsPad] p3: gap=5
Clearance "Via-Pad Clearance" [IsVia vs IsPad] p4: gap=3.94
Clearance "General Clearance" [All] p5: gap=5
ComponentClearance [All] p1 off: gap=7.87 collisioncheckmode=3 verticalgap=10 showdistances=FALSE
DiffPairsRouting [All] p1: maxlimit=5 minlimit=5 mostfreqgap=5 maxuncoupledlength=200
FabricationTestPointUsage TestPointUsage [All] p1 off: valid=0 allowmultiple=FALSE
FabricationTestpoint Testpoint [All] p1 off: side=3 testpointundercomponent=TRUE minsize=40 maxsize=100 preferedsize=60 minholesize=0 maxholesize=40 preferedholesize=32 testpointgrid=1 allowsidetop=TRUE allowsidebottom=TRUE usegrid=TRUE gridtolerance=0.01
HoleSize [All] p1: absolutevalues=TRUE maxlimit=204.72 minlimit=7.87 maxpercent=80.000 minpercent=20.000
HoleToHoleClearance [All] p1: gap=4 allowstackedmicrovias=TRUE
MatchedLengths DiffPair_MatchedLengths [(IsDifferentialPair And (Name = 'DIFF_RX1'))] p1: tolerance=1000 checknetsindiffpair=TRUE checkdiffpairvsdiffpair=TRUE checkothers=TRUE
MinimumAnnularRing MinimumAnnularRing_NonPlated [(ObjectKind = 'Pad') And (HoleDiameter >= '0.7') And (PadIsPlated = 'False')] p1: minimumring=-196.85
MinimumAnnularRing [All] p2: minimumring=5.91
MinimumSolderMaskSliver [All] p1: minsoldermaskwidth=2
PlaneClearance [All] p1: clearance=10
PlaneConnect [All] p1: planeconnectstyle=Direct reliefexpansion=19.68 reliefentries=4 reliefconductorwidth=9.84 reliefairgap=9.84
PolygonConnect PolygonConnect_Via [IsVia] p1: connectstyle=Direct reliefconductorwidth=10 reliefentries=4 polygonreliefangle="90 Angle"
PolygonConnect "PolygonConnect - Heatsink" [(HasFootprint('TO-263') AND InNet('VCCINT'))] p2: connectstyle=Direct reliefconductorwidth=10 reliefentries=4 polygonreliefangle="90 Angle"
PolygonConnect [All] p3: connectstyle=Relief reliefconductorwidth=11.81 reliefentries=4 polygonreliefangle="90 Angle"
RoutingVias [All] p1: holewidth=11.81 width=23.62 viastyle="Through Hole" minholewidth=11.81 minwidth=23.62 maxholewidth=19.68 maxwidth=35.43
ShortCircuit ShortCircuit_1 [Net = 'No Net' vs Net = 'No Net'] p1: allowed=TRUE
ShortCircuit [All] p2: allowed=FALSE
SilkToSilkClearance SilkToSilkClearance_InvToFill [(ObjectKind = 'Text') And (TextKind <> 'Stroke Font') vs IsFill] p1: silktosilkclearance=0
SilkToSilkClearance SilkToSilkClearance_Labels [(ObjectKind = 'Text') And (TextKind <> 'Stroke Font') vs (ObjectKind = 'Text') And (TextKind <> 'Stroke Font')] p2: silktosilkclearance=0
SilkToSilkClearance SilkToSilkClearance_Pb [(ObjectKind = 'Text') And (StringText = 'Pb') vs istrack and onsilkscreen] p3: silktosilkclearance=0
SilkToSilkClearance [All] p4: silktosilkclearance=2
SilkscreenOverComponentPads [All] p1: minsilkscreentomaskgap=2
SolderMaskExpansion SolderMaskExpansion_Vias [IsVia] p1: expansion=-25.59
SolderMaskExpansion [All] p2: expansion=1.5
Width [All] p1: maxlimit=98.43 minlimit=5 preferedwidth=5
16 further rules are at their usual default settings.

## Classes and differential pairs
channel class SRAM_256Kx16_TSOP44: U_SRAM_K6R4016V1D-TC10T_256Kx161 U_SRAM_K6R4016V1D-TC10T_256Kx162
component class U_Bypass_Board: C106 C107
component class U_PSU_MAX8860_ADJ: C125 C126 C127 R24 R25 U6
component class COM_SRAM: C144 C145 C146 C147 C148 C149 C150 C151 U11 U12
component class COM_SDRAM: C128 C129 C130 C131 C132 C133 C134 C135 U7 U8
component class U_PSU_MAX1831_1V2_ALT: C117 C118 C119 C120 C121 C122 C123 C124 L1 R19 R20 R21 R22 R23 TP7 TP8 U5
component class U_SRAM_K6R4016V1D-TC10T_256Kx162: C1_SM C2_SM C4_SM C140 C141 C142 C143 U1_SM U10
component class U_SRAM_K6R4016V1D-TC10T_256Kx161: C136 C137 C138 C139 U9
component class U_DaughterBoard_LEDS: C108 LED1 LED2 R1 R2 U2
component class COM_FLASH: C109 C110 C111 C112 C113 C114 U3
component class U_CommonMemory_Termination: RN1 RN2 RN3 RN4 RN5 RN6 RN7 RN8 RN9 RN10 RN11 RN12 RN13 RN14 RN15 RN16 RN17 RN18 RN19 RN20 RN21 RN22 RN23 RN24 RN25 RN26 RN27 RN28 RN29 RN30 RN31 RN32 RN35 RN36
component class U_1WB_DS2406_EPROM: C1 C2 U1
net class SRAM2_D[15..0]: SRAM2_D0 SRAM2_D1 SRAM2_D2 SRAM2_D3 SRAM2_D4 SRAM2_D5 SRAM2_D6 SRAM2_D7 SRAM2_D8 SRAM2_D9 SRAM2_D10 SRAM2_D11 SRAM2_D12 SRAM2_D13 SRAM2_D14 SRAM2_D15
net class SRAM2_A[18..0]: SRAM2_A0 SRAM2_A1 SRAM2_A2 SRAM2_A3 SRAM2_A4 SRAM2_A5 SRAM2_A6 SRAM2_A7 SRAM2_A8 SRAM2_A9 SRAM2_A10 SRAM2_A11 SRAM2_A12 SRAM2_A13 SRAM2_A14 SRAM2_A15 SRAM2_A16 SRAM2_A17 SRAM2_A18
net class SRAM1_D[15..0]: SRAM1_D0 SRAM1_D1 SRAM1_D2 SRAM1_D3 SRAM1_D4 SRAM1_D5 SRAM1_D6 SRAM1_D7 SRAM1_D8 SRAM1_D9 SRAM1_D10 SRAM1_D11 SRAM1_D12 SRAM1_D13 SRAM1_D14 SRAM1_D15
net class SRAM1_A[18..0]: SRAM1_A0 SRAM1_A1 SRAM1_A2 SRAM1_A3 SRAM1_A4 SRAM1_A5 SRAM1_A6 SRAM1_A7 SRAM1_A8 SRAM1_A9 SRAM1_A10 SRAM1_A11 SRAM1_A12 SRAM1_A13 SRAM1_A14 SRAM1_A15 SRAM1_A16 SRAM1_A17 SRAM1_A18
component class U_PSU: C115 C116 NT8 R18 TP1 TP2 TP3 TP4 TP5
net class EXTEND_C[49..0]: EXTEND_C0 EXTEND_C1 EXTEND_C2 EXTEND_C3 EXTEND_C4 EXTEND_C5 EXTEND_C6 EXTEND_C7 EXTEND_C8 EXTEND_C9 EXTEND_C10 EXTEND_C11 EXTEND_C12 EXTEND_C13 EXTEND_C14 EXTEND_C15 EXTEND_C16 EXTEND_C17 EXTEND_C18 EXTEND_C19 EXTEND_C20 EXTEND_C21 EXTEND_C22 EXTEND_C23 EXTEND_C24 EXTEND_C25 EXTEND_C26 EXTEND_C27 EXTEND_C28 EXTEND_C29 EXTEND_C30 EXTEND_C31 EXTEND_C32 EXTEND_C33 EXTEND_C34 EXTEND_C35 EXTEND_C36 EXTEND_C37 EXTEND_C38 EXTEND_C39 EXTEND_C40 EXTEND_C41 EXTEND_C42 EXTEND_C43 EXTEND_C44 EXTEND_C45 EXTEND_C46 EXTEND_C47 EXTEND_C48 EXTEND_C49
net class EXTEND_B[49..0]: EXTEND_B0 EXTEND_B1 EXTEND_B2 EXTEND_B3 EXTEND_B4 EXTEND_B5 EXTEND_B6 EXTEND_B7 EXTEND_B8 EXTEND_B9 EXTEND_B10 EXTEND_B11 EXTEND_B12 EXTEND_B13 EXTEND_B14 EXTEND_B15 EXTEND_B16 EXTEND_B17 EXTEND_B18 EXTEND_B19 EXTEND_B20 EXTEND_B21 EXTEND_B22 EXTEND_B23 EXTEND_B24 EXTEND_B25 EXTEND_B26 EXTEND_B27 EXTEND_B28 EXTEND_B29 EXTEND_B30 EXTEND_B31 EXTEND_B32 EXTEND_B33 EXTEND_B34 EXTEND_B35 EXTEND_B36 EXTEND_B37 EXTEND_B38 EXTEND_B39 EXTEND_B40 EXTEND_B41 EXTEND_B42 EXTEND_B43 EXTEND_B44 EXTEND_B45 EXTEND_B46 EXTEND_B47 EXTEND_B48 EXTEND_B49
net class EXTEND_A[49..0]: EXTEND_A0 EXTEND_A1 EXTEND_A2 EXTEND_A3 EXTEND_A4 EXTEND_A5 EXTEND_A6 EXTEND_A7 EXTEND_A8 EXTEND_A9 EXTEND_A10 EXTEND_A11 EXTEND_A12 EXTEND_A13 EXTEND_A14 EXTEND_A15 EXTEND_A16 EXTEND_A17 EXTEND_A18 EXTEND_A19 EXTEND_A20 EXTEND_A21 EXTEND_A22 EXTEND_A23 EXTEND_A24 EXTEND_A25 EXTEND_A26 EXTEND_A27 EXTEND_A28 EXTEND_A29 EXTEND_A30 EXTEND_A31 EXTEND_A32 EXTEND_A33 EXTEND_A34 EXTEND_A35 EXTEND_A36 EXTEND_A37 EXTEND_A38 EXTEND_A39 EXTEND_A40 EXTEND_A41 EXTEND_A42 EXTEND_A43 EXTEND_A44 EXTEND_A45 EXTEND_A46 EXTEND_A47 EXTEND_A48 EXTEND_A49
net class DAU_TFT_RED[4..0]: DAU_TFT_RED0 DAU_TFT_RED1 DAU_TFT_RED2 DAU_TFT_RED3 DAU_TFT_RED4
net class DAU_TFT_GREEN[5..0]: DAU_TFT_GREEN0 DAU_TFT_GREEN1 DAU_TFT_GREEN2 DAU_TFT_GREEN3 DAU_TFT_GREEN4 DAU_TFT_GREEN5
net class DAU_TFT_CL[3..1]: DAU_TFT_CL1 DAU_TFT_CL2 DAU_TFT_CL3
net class DAU_TFT_BLUE[4..0]: DAU_TFT_BLUE0 DAU_TFT_BLUE1 DAU_TFT_BLUE2 DAU_TFT_BLUE3 DAU_TFT_BLUE4
net class BUS_A[24..1]: BUS_A1 BUS_A2 BUS_A3 BUS_A4 BUS_A5 BUS_A6 BUS_A7 BUS_A8 BUS_A9 BUS_A10 BUS_A11 BUS_A12 BUS_A13 BUS_A14 BUS_A15 BUS_A16 BUS_A17 BUS_A18 BUS_A19 BUS_A20 BUS_A21 BUS_A22 BUS_A23 BUS_A24
net class CLKS: BUS_SDRAM_CLK BUS_SDRAM_FEEDBACK FPGA_CLK FPGA_CLK1 ONE_WIRE_DB_PB REF_CLK UGCLK0 UGCLK1 UGCLK2
component class U_Bypass_3V3: C42 C43 C44 C45 C46 C47 C48 C49 C50 C51 C52 C53 C54 C55 C56 C57 C58 C59 C60 C61 C62 C63 C64 C65 C66 C67 C68 C69 C70 C71 C72 C73 C74 C75 C76 C77 C78 C79 C80 C81 C82 C83 C84 C85 C86 C87 C88 C89 C90 C91 C92 C93 C94 C95 C96 C97 C98 C99 C100 C101 C102 C102_FP C103 C103_FP C104 C104_FP C105 C105_FP C106_FP
component class U_MotherBoardConnectors: HDR_B1 HDR_L HDR_L1 HDR_T1 NT1
component class U_FPGA: D1 F1 J1_U NT2 NT3 NT4 NT5 NT6 NT7 R1HD R2HD R3 R3HD R4 R4HD R5 R6 R7 R8 R9 R10 R11 R12 R13 R14 R15 R16 R17 U4
net class BUS_D[31..0]: BUS_D0 BUS_D1 BUS_D2 BUS_D3 BUS_D4 BUS_D5 BUS_D6 BUS_D7 BUS_D8 BUS_D9 BUS_D10 BUS_D11 BUS_D12 BUS_D13 BUS_D14 BUS_D15 BUS_D16 BUS_D17 BUS_D18 BUS_D19 BUS_D20 BUS_D21 BUS_D22 BUS_D23 BUS_D24 BUS_D25 BUS_D26 BUS_D27 BUS_D28 BUS_D29 BUS_D30 BUS_D31
net class BUS_NBE[3..0]: BUS_NBE0 BUS_NBE1 BUS_NBE2 BUS_NBE3
net class DIP[7..0]: DIP0 DIP1 DIP2 DIP3 DIP4 DIP5 DIP6 DIP7
net class FPGA_ID[3..0]: FPGA_ID0 FPGA_ID1 FPGA_ID2 FPGA_ID3
net class FPGA_M[2..0]: FPGA_M0 FPGA_M1 FPGA_M2
net class IO[35..0]: IO0 IO1 IO2 IO3 IO4 IO5 IO6 IO7 IO8 IO9 IO10 IO11 IO12 IO13 IO14 IO15 IO16 IO17 IO18 IO19 IO20 IO21 IO22 IO23 IO24 IO25 IO26 IO27 IO28 IO29 IO30 IO31 IO32 IO33 IO34 IO35
net class LED[7..0]: LED0 LED1 LED2 LED3 LED4 LED5 LED6 LED7
net class SW[4..0]: SW0 SW1 SW2 SW3 SW4
differential pair class DIFF_IN: DIFF_RX0 DIFF_RX1 DIFF_RX2 DIFF_RX3
differential pair class DIFF_OUT: DIFF_TX0 DIFF_TX1 DIFF_TX2 DIFF_TX3
net class PWRNET: 1V2 2V5 3V3 5V0 AGND GND
net class UGCLK[2..0]: UGCLK0 UGCLK1 UGCLK2
component class U_MOUNTS: "Altium Logo Bot1" "Altium Logo Top1" LB1 MH1 MH2 MH3
component class U_Bypass_1V2: C3 C4 C5 C6 C7 C8 C9 C10 C11 C12 C13 C14 C15 C16 C17 C18 C19 C20 C21 C22
component class U_Bypass_2V5: C23 C24 C25 C26 C27 C28 C29 C30 C31 C32 C33 C34 C35 C36 C37 C38 C39 C40 C41
component class U_DB30_Hardware_Kit: PCB1

## Components (designator, comment, footprint, x,y, rotation, side; value= is the part's Value field where it differs from the comment)
"Altium Logo Bot1" "Altium" Logo-Altium 2177.16,129.92 r180 bottom
"Altium Logo Top1" "Altium" Logo-Altium 1051.18,129.92 r0 top
C1 "0.1uF 16V" CAPC1005-STAR#1 2807.08,3015.74 r180 bottom
C2 "10nF 16V" CAPC1005-STAR#1 2807.08,2968.5 r0 bottom
C3 "220uF 10V" CAPC7343-STAR 2492.13,1551.18 r0 bottom (schematic designator C1)
C4 "10uF 10V" CAPC2012-STAR 889.76,1551.18 r90 bottom (schematic designator C2)
C5 "10uF 10V" CAPC2012-STAR 1606.3,838.58 r0 bottom (schematic designator C3)
C6 "10uF 10V" CAPC2012-STAR 2153.54,1551.18 r90 bottom (schematic designator C4)
C7 "0.1uF 16V" CAPC1005-STAR#1 1689.96,1256.89 r180 bottom (schematic designator C5)
C8 "0.1uF 16V" CAPC1005-STAR#1 1771.65,1306.1 r90 bottom (schematic designator C6)
C9 "0.1uF 16V" CAPC1005-STAR#1 1356.3,1253.94 r0 bottom (schematic designator C7)
C10 "0.1uF 16V" CAPC1005-STAR#1 1771.65,1638.78 r270 bottom (schematic designator C8)
C11 "0.1uF 16V" CAPC1005-STAR#1 1306.1,1305.12 r90 bottom (schematic designator C9)
C12 "0.1uF 16V" CAPC1005-STAR#2 1689.96,1687.01 r180 bottom (schematic designator C10)
C13 "0.1uF 16V" CAPC1005-STAR#1 1275.59,1638.78 r270 bottom (schematic designator C11)
C14 "0.1uF 16V" CAPC1005-STAR#2 1357.28,1687.01 r0 bottom (schematic designator C12)
C15 "10nF 16V" CAPC1005-STAR#1 1689.96,1224.41 r180 bottom (schematic designator C13)
C16 "10nF 16V" CAPC1005-STAR#1 1738.19,1306.1 r90 bottom (schematic designator C14)
C17 "10nF 16V" CAPC1005-STAR#2 1738.19,1638.78 r270 bottom (schematic designator C15)
C18 "10nF 16V" CAPC1005-STAR#1 1357.28,1720.47 r0 bottom (schematic designator C16)
C19 "10nF 16V" CAPC1005-STAR#1 1275.59,1305.12 r90 bottom (schematic designator C17)
C20 "10nF 16V" CAPC1005-STAR#1 1356.3,1224.41 r0 bottom (schematic designator C18)
C21 "10nF 16V" CAPC1005-STAR#1 1689.96,1720.47 r180 bottom (schematic designator C19)
C22 "10nF 16V" CAPC1005-STAR#2 1309.05,1638.78 r270 bottom (schematic designator C20)
C23 "220uF 10V" CAPC7343-STAR 767.72,818.9 r180 top (schematic designator C1)
C24 "10uF 10V" CAPC2012-STAR 2586.61,2405.51 r90 top (schematic designator C2)
C25 "10uF 10V" CAPC2012-STAR 1397.64,2106.29 r180 bottom (schematic designator C3)
C26 "0.1uF 16V" CAPC1005-STAR#1 1728.34,2035.43 r90 bottom (schematic designator C4)
C27 "0.1uF 16V" CAPC1005-STAR#1 2073.29,1678.7 r0 bottom (schematic designator C5)
C28 "0.1uF 16V" CAPC1005-STAR#1 960.63,1267.71 r180 bottom (schematic designator C6)
C29 "0.1uF 16V" CAPC1005-STAR#1 1318.89,2035.43 r90 bottom (schematic designator C7)
C30 "0.1uF 16V" CAPC1005-STAR#1 1728.34,909.45 r270 bottom (schematic designator C8)
C31 "10nF 16V" CAPC1005-STAR#1 1965.14,981.04 r90 bottom (schematic designator C9)
C32 "10nF 16V" CAPC1005-STAR#1 960.63,1677.16 r180 bottom (schematic designator C10)
C33 "10nF 16V" CAPC1005-STAR#1 1082.1,1963.84 r270 bottom (schematic designator C11)
C34 "10nF 16V" CAPC1005-STAR#1 1963.99,1963.84 r270 bottom (schematic designator C12)
C35 "10nF 16V" CAPC1005-STAR#1 1032.22,1030.92 r0 bottom (schematic designator C13)
C36 "10nF 16V" CAPC1005-STAR#1 2015.02,1032.07 r180 bottom (schematic designator C14)
C37 "10nF 16V" CAPC1005-STAR#1 2015.02,1913.96 r180 bottom (schematic designator C15)
C38 "10nF 16V" CAPC1005-STAR#1 1083.25,981.04 r90 bottom (schematic designator C16)
C39 "10nF 16V" CAPC1005-STAR#1 2086.61,1267.71 r0 bottom (schematic designator C17)
C40 "10nF 16V" CAPC1005-STAR#1 1318.89,909.45 r270 bottom (schematic designator C18)
C41 "10nF 16V" CAPC1005-STAR#1 1032.22,1912.81 r0 bottom (schematic designator C19)
C42 "10uF 10V" CAPC2012-STAR 1240.15,2106.29 r0 bottom (schematic designator C1)
C43 "10uF 10V" CAPC2012-STAR 889.76,1716.53 r270 bottom (schematic designator C2)
C44 "10uF 10V" CAPC2012-STAR 1807.21,2105.29 r180 bottom (schematic designator C3)
C45 "10uF 10V" CAPC2012-STAR 889.76,1188.97 r90 bottom (schematic designator C4)
C46 "10uF 10V" CAPC2012-STAR 2153.54,1708.66 r270 bottom (schematic designator C5)
C47 "10uF 10V" CAPC2012-STAR 2157.48,1185.04 r90 bottom (schematic designator C6)
C48 "10uF 10V" CAPC2012-STAR 1771.65,838.58 r180 bottom (schematic designator C7)
C49 "10uF 10V" CAPC2012-STAR 1236.22,838.58 r0 bottom (schematic designator C8)
C50 "0.1uF 16V" CAPC1005-STAR#1 2015.74,1173.23 r0 bottom (schematic designator C9)
C51 "0.1uF 16V" CAPC1005-STAR#1 1779.52,980.31 r270 bottom (schematic designator C10)
C52 "0.1uF 16V" CAPC1005-STAR#1 1622.04,980.31 r270 bottom (schematic designator C11)
C53 "0.1uF 16V" CAPC1005-STAR#1 1031.49,1334.64 r180 bottom (schematic designator C12)
C54 "0.1uF 16V" CAPC1005-STAR#1 2015.74,1724.41 r0 bottom (schematic designator C13)
C55 "0.1uF 16V" CAPC1005-STAR#1 2015.74,1374.01 r0 bottom (schematic designator C14)
C56 "0.1uF 16V" CAPC1005-STAR#1 1031.49,1220.47 r180 bottom (schematic designator C15)
C57 "0.1uF 16V" CAPC1005-STAR#1 1429.13,980.31 r270 bottom (schematic designator C16)
C58 "0.1uF 16V" CAPC1005-STAR#1 1031.49,1570.86 r180 bottom (schematic designator C17)
C59 "0.1uF 16V" CAPC1005-STAR#1 1228.34,1964.56 r90 bottom (schematic designator C18)
C60 "0.1uF 16V" CAPC1005-STAR#1 1822.83,1964.56 r90 bottom (schematic designator C19)
C61 "0.1uF 16V" CAPC1005-STAR#1 1031.49,1728.34 r180 bottom (schematic designator C20)
C62 "0.1uF 16V" CAPC1005-STAR#1 1228.34,980.31 r270 bottom (schematic designator C21)
C63 "0.1uF 16V" CAPC1005-STAR#1 2015.74,1566.93 r0 bottom (schematic designator C22)
C64 "0.1uF 16V" CAPC1005-STAR#1 1665.35,1964.56 r90 bottom (schematic designator C23)
C65 "0.1uF 16V" CAPC1005-STAR#1 1429.13,1964.56 r90 bottom (schematic designator C24)
C66 "10nF 16V" CAPC1005-STAR#1 1366.14,1457.68 r0 bottom (schematic designator C25)
C67 "10nF 16V" CAPC1005-STAR#1 1508.86,1629.92 r270 bottom (schematic designator C26)
C68 "10nF 16V" CAPC1005-STAR#1 1779.52,1964.56 r90 bottom (schematic designator C27)
C69 "10nF 16V" CAPC1005-STAR#1 1822.83,980.31 r270 bottom (schematic designator C28)
C70 "10nF 16V" CAPC1005-STAR#1 1271.65,1964.56 r90 bottom (schematic designator C29)
C71 "10nF 16V" CAPC1005-STAR#1 2015.74,1610.23 r0 bottom (schematic designator C30)
C72 "10nF 16V" CAPC1005-STAR#1 1681.1,1487.2 r180 bottom (schematic designator C31)
C73 "10nF 16V" CAPC1005-STAR#1 1508.86,1553.15 r90 bottom (schematic designator C32)
C74 "10nF 16V" CAPC1005-STAR#1 1538.39,1553.15 r90 bottom (schematic designator C33)
C75 "10nF 16V" CAPC1005-STAR#1 1538.39,1629.92 r270 bottom (schematic designator C34)
C76 "10nF 16V" CAPC1005-STAR#1 1758.86,1457.68 r0 bottom (schematic designator C35)
C77 "10nF 16V" CAPC1005-STAR#1 1681.1,1457.68 r180 bottom (schematic designator C36)
C78 "10nF 16V" CAPC1005-STAR#1 1604.33,1487.2 r0 bottom (schematic designator C37)
C79 "10nF 16V" CAPC1005-STAR#1 1289.37,1487.2 r180 bottom (schematic designator C38)
C80 "10nF 16V" CAPC1005-STAR#1 1508.86,1706.69 r90 bottom (schematic designator C39)
C81 "10nF 16V" CAPC1005-STAR#1 1289.37,1457.68 r180 bottom (schematic designator C40)
C82 "10nF 16V" CAPC1005-STAR#1 1508.86,1390.75 r270 bottom (schematic designator C41)
C83 "10nF 16V" CAPC1005-STAR#1 1385.82,980.31 r270 bottom (schematic designator C42)
C84 "10nF 16V" CAPC1005-STAR#1 1031.49,1177.16 r180 bottom (schematic designator C43)
C85 "10nF 16V" CAPC1005-STAR#1 1271.65,980.31 r270 bottom (schematic designator C44)
C86 "10nF 16V" CAPC1005-STAR#1 1508.86,1237.2 r270 bottom (schematic designator C45)
C87 "10nF 16V" CAPC1005-STAR#1 1538.39,1237.2 r270 bottom (schematic designator C46)
C88 "10nF 16V" CAPC1005-STAR#1 1508.86,1313.98 r90 bottom (schematic designator C47)
C89 "10nF 16V" CAPC1005-STAR#1 2015.74,1767.71 r0 bottom (schematic designator C48)
C90 "10nF 16V" CAPC1005-STAR#1 1604.33,1457.68 r0 bottom (schematic designator C49)
C91 "10nF 16V" CAPC1005-STAR#1 1665.35,980.31 r270 bottom (schematic designator C50)
C92 "10nF 16V" CAPC1005-STAR#1 1538.39,1313.98 r90 bottom (schematic designator C51)
C93 "10nF 16V" CAPC1005-STAR#1 1366.14,1487.2 r0 bottom (schematic designator C52)
C94 "10nF 16V" CAPC1005-STAR#1 1442.91,1487.2 r180 bottom (schematic designator C53)
C95 "10nF 16V" CAPC1005-STAR#1 1442.91,1457.68 r180 bottom (schematic designator C54)
C96 "10nF 16V" CAPC1005-STAR#1 1758.86,1487.2 r0 bottom (schematic designator C55)
C97 "10nF 16V" CAPC1005-STAR#1 1538.39,1706.69 r90 bottom (schematic designator C56)
C98 "10nF 16V" CAPC1005-STAR#1 1538.39,1390.75 r270 bottom (schematic designator C57)
C99 "10nF 16V" CAPC1005-STAR#1 1622.04,1964.56 r90 bottom (schematic designator C58)
C100 "10nF 16V" CAPC1005-STAR#1 1385.82,1964.56 r90 bottom (schematic designator C59)
C101 "10nF 16V" CAPC1005-STAR#1 1031.49,1377.95 r180 bottom (schematic designator C60)
C102 "10nF 16V" CAPC1005-STAR#1 1031.49,1614.17 r180 bottom (schematic designator C61)
C103 "10nF 16V" CAPC1005-STAR#1 2015.74,1216.53 r0 bottom (schematic designator C62)
C104 "10nF 16V" CAPC1005-STAR#1 1031.49,1771.65 r180 bottom (schematic designator C63)
C105 "10nF 16V" CAPC1005-STAR#1 2015.74,1330.71 r0 bottom (schematic designator C64)
C106 "220uF 10V" CAPC7343-STAR 681.1,1255.9 r270 bottom (schematic designator C1_MB)
C107 "220uF 10V" CAPC7343-STAR 1870.07,2862.2 r180 bottom (schematic designator C2_MB)
C108 "0.1uF 16V" CAPC1005-STAR#1 1259.84,236.22 r0 bottom (schematic designator C1_SL)
C109 "0.1uF 16V" CAPC1005-STAR#1 2370.07,2799.21 r180 bottom (schematic designator C1)
C110 "0.1uF 16V" CAPC1005-STAR#1 2263.78,3233.27 r180 bottom (schematic designator C2)
C111 "10nF 16V" CAPC1005-STAR#1 2185.04,2969.49 r270 bottom (schematic designator C3)
C112 "10nF 16V" CAPC1005-STAR#1 2370.07,2842.51 r180 bottom (schematic designator C4)
C113 "10nF 16V" CAPC1005-STAR#1 2263.78,3186.02 r180 bottom (schematic designator C5)
C114 "0.1uF 16V" CAPC1005-STAR#1 2141.73,2969.49 r270 bottom (schematic designator C6)
C115 "10uF 10V" CAPC2012-STAR 2765.75,3087.59 r0 bottom (schematic designator C23_CM)
C116 "10uF 10V" CAPC2012-STAR 2216.53,3986.21 r270 bottom (schematic designator C24_CM)
C117 "470pF 50V" CAPC1005-STAR#1 2944.88,1740.15 r90 top (schematic designator C2_PS)
C118 "2.2uF 10V" CAPC1608-STAR 2456.69,1692.91 r180 top (schematic designator C4_PS)
C119 "220uF 10V" CAPC7343-STAR 2814.95,2149.6 r180 top (schematic designator C3_PS)
C120 "10uF 10V" CAPC2012-STAR 2988.18,1425.19 r270 top (schematic designator C5_PS)
C121 "22uF 10V" CAPC3225-STAR 2748.03,1503.93 r180 top (schematic designator C6_PS)
C122 "10uF 10V" CAPC2012-STAR 3118.1,1795.27 r270 top (schematic designator C8_PS)
C123 "22uF 10V" CAPC3225-STAR 2637.79,1976.37 r180 top (schematic designator C1_PS)
C124 "1uF 25V" CAPC3216-STAR 2448.81,1783.46 r0 top (schematic designator C7_PS)
C125 "2.2uF 10V" CAPC1608-STAR 1744.09,2401.57 r180 top (schematic designator C3_LD)
C126 "2.2uF 10V" CAPC1608-STAR 1657.48,2515.74 r270 top (schematic designator C1_LD)
C127 "0.033uF 10V" CAPC1005-STAR#1 2015.74,2547.24 r0 top (schematic designator C2_LD)
C128 "0.1uF 16V" CAPC1005-STAR#1 2149.6,4007.87 r270 top (schematic designator C1)
C129 "0.1uF 16V" CAPC1005-STAR#1 1535.43,3374.01 r180 top (schematic designator C2)
C130 "0.1uF 16V" CAPC1005-STAR#1 1279.52,3405.5 r180 bottom (schematic designator C3)
C131 "0.1uF 16V" CAPC1005-STAR#1 1803.15,3999.99 r90 bottom (schematic designator C4)
C132 "10nF 16V" CAPC1005-STAR#1 1440.94,3980.31 r180 top (schematic designator C5)
C133 "10nF 16V" CAPC1005-STAR#1 1629.92,3980.31 r180 top (schematic designator C6)
C134 "10nF 16V" CAPC1005-STAR#1 2039.37,3374.01 r180 bottom (schematic designator C7)
C135 "10nF 16V" CAPC1005-STAR#1 1850.39,3374.01 r180 bottom (schematic designator C8)
C136 "0.1uF 16V" CAPC1005-STAR#1 2915.44,1059.04 r90 top (schematic designator C1_SM)
C137 "0.1uF 16V" CAPC1005-STAR#1 2309.14,1055.11 r270 top (schematic designator C2_SM)
C138 "10nF 16V" CAPC1005-STAR#1 2915.44,980.3 r270 top (schematic designator C3_SM)
C139 "10nF 16V" CAPC1005-STAR#1 2259.84,1055.12 r270 top (schematic designator C4_SM)
C140 "0.1uF 16V" CAPC1005-STAR#1 2391.82,980.3 r270 bottom (schematic designator C1_SM)
C141 "0.1uF 16V" CAPC1005-STAR#1 3007.87,1133.86 r90 bottom (schematic designator C2_SM)
C142 "10nF 16V" CAPC1005-STAR#1 2391.82,1062.98 r90 bottom (schematic designator C3_SM)
C143 "10nF 16V" CAPC1005-STAR#1 3007.87,1055.12 r270 bottom (schematic designator C4_SM)
C144 "0.1uF 16V" CAPC1005-STAR#1 2604.05,3326.76 r0 top (schematic designator C1)
C145 "0.1uF 16V" CAPC1005-STAR#1 2602.36,4027.55 r180 top (schematic designator C2)
C146 "0.1uF 16V" CAPC1005-STAR#1 2602.36,3330.7 r0 bottom (schematic designator C3)
C147 "0.1uF 16V" CAPC1005-STAR#1 2665.35,4027.55 r0 bottom (schematic designator C4)
C148 "10nF 16V" CAPC1005-STAR#1 2604.05,3370.07 r0 top (schematic designator C5)
C149 "10nF 16V" CAPC1005-STAR#1 2602.08,3984.25 r180 top (schematic designator C6)
C150 "10nF 16V" CAPC1005-STAR#1 2602.36,3370.07 r0 bottom (schematic designator C7)
C151 "10nF 16V" CAPC1005-STAR#1 2665.35,3984.25 r0 bottom (schematic designator C8)
HDR_B1 "MOLEX - 54075-1009" 54075 1893.7,472.44 r0 bottom locked (schematic designator HDR_B)
HDR_L1 "MOLEX - 54075-1009" 54075 307.09,1472.44 r270 bottom locked (schematic designator HDR_L)
HDR_T1 "MOLEX - 54075-1009" 54075 1893.7,2472.44 r0 bottom locked (schematic designator HDR_T)
L1 "2u2, 15A, 4R2, SMD" IND-EPCOS-SMD-B82559 2944.88,1649.6 r90 bottom (schematic designator L1_PS)
LED1 "GREEN" LED2012-STAR 1261.81,169.29 r180 top (schematic designator LED2_SL)
LED2 "RED" LED2012-STAR 1974.41,169.29 r180 top (schematic designator LED1_SL)
MH1 "MOUNTING HOLE 3MM" MOUNTING_HOLE_3MM 1618.11,129.92 r180 top locked
MH2 "MOUNTING HOLE 3MM" MOUNTING_HOLE_3MM 129.92,4326.77 r180 top locked
MH3 "MOUNTING HOLE 3MM" MOUNTING_HOLE_3MM 3106.3,4326.77 r180 top locked
NT1 "Net Tie SMT2" NETTIE-SMT2-8X8 1626.22,2700.43 r90 bottom net-tie
NT2 "Net Tie SMT2" NETTIE-SMT2-8X8 1464.21,258.62 r0 bottom net-tie (schematic designator NT6)
NT3 "Net Tie SMT2" NETTIE-SMT2-8X8 1550.94,2165 r90 top net-tie (schematic designator NT8)
NT4 "Net Tie SMT2" NETTIE-SMT2-8X8 1752.2,2680.73 r90 bottom net-tie (schematic designator NT2)
NT5 "Net Tie SMT2" NETTIE-SMT2-8X8 1720.7,2680.73 r90 bottom net-tie (schematic designator NT3)
NT6 "Net Tie SMT2" NETTIE-SMT2-8X8 1689.21,2680.74 r90 bottom net-tie (schematic designator NT4)
NT7 "Net Tie SMT2" NETTIE-SMT2-8X8 1657.71,2680.74 r90 bottom net-tie (schematic designator NT5)
NT8 "Net Tie SMT2" NETTIE-SMT2-8X8 2519.44,1982.83 r90 top net-tie (schematic designator NT7)
PBFREE "" LEAD_FREE_S 292.32,3631.89 r180 bottom
R1 "270R 1%" RESC1005-STAR 1248.03,169.29 r180 bottom (schematic designator R2_SL)
R2 "270R 1%" RESC1005-STAR 1974.41,169.29 r180 bottom (schematic designator R1_SL)
R3 "4K7 1%" RESC1005-STAR 866.14,2145.66 r180 bottom (schematic designator R1)
R4 "100R 1%" RESC1005-STAR 984.25,2145.66 r0 bottom (schematic designator R7)
R5 "4K7 1%" RESC1005-STAR 2129.92,2106.29 r90 bottom (schematic designator R2)
R6 "100R 1%" RESC1005-STAR 1968.5,2106.29 r270 bottom (schematic designator R8)
R7 "100R 1%" RESC1005-STAR 2047.24,2106.3 r270 bottom (schematic designator R9)
R8 "100R 1%" RESC1005-STAR 2129.92,2023.62 r270 bottom (schematic designator R10)
R9 "4K7 1%" RESC1005-STAR 2039.37,866.14 r180 bottom (schematic designator R3)
R10 "100R 1%" RESC1005-STAR 984.25,2094.48 r180 bottom (schematic designator R12)
R11 "100R 1%" RESC1005-STAR 885.82,925.2 r0 bottom (schematic designator R14)
R12 "4K7 1%" RESC1005-STAR 2165.35,925.2 r180 bottom (schematic designator R4)
R13 "100R 1%" RESC1005-STAR 885.82,968.5 r0 bottom (schematic designator R18)
R14 "100R 1%" RESC1005-STAR 885.82,881.89 r0 bottom (schematic designator R23)
R15 "100R 1%" RESC1005-STAR 866.14,2094.48 r180 bottom (schematic designator R24)
R16 "100R 1%" RESC1005-STAR 2165.35,984.25 r180 bottom (schematic designator R22)
R17 "100R 1%" RESC1005-STAR 2165.35,1043.31 r180 bottom (schematic designator R20)
R18 "100K 1%" RESC1005-STAR 1826.77,2358.26 r180 top (schematic designator R1T)
R19 "10R 1%" RESC1005-STAR 2492.12,1622.04 r90 top (schematic designator R2_PS)
R20 "2K7 1%" RESC1005-STAR 2787.4,1866.14 r0 top (schematic designator R1_PS)
R21 "27K 1%" RESC1005-STAR 2889.76,1866.14 r0 top (schematic designator R3_PS)
R22 "2K7 1%" RESC1005-STAR 2992.12,1866.14 r0 top (schematic designator R4_PS)
R23 "100K 1%" RESC1005-STAR 2992.12,1814.96 r0 top (schematic designator R5_PS)
R24 "100K 1%" RESC1005-STAR 1720.47,2637.79 r0 top (schematic designator R1_LD)
R25 "100K 1%" RESC1005-STAR 1854.33,2413.38 r180 top (schematic designator R2_LD)
RN1 "RESNET 4 x 100R" RESNET-1005X4 1662.98,3301.18 r90 bottom (schematic designator RN33)
RN2 "RESNET 4 x 100R" RESNET-1005X4 1366.74,3301.18 r90 bottom (schematic designator RN35)
RN3 "RESNET 4 x 100R" RESNET-1005X4 1559.65,4025.59 r90 bottom (schematic designator RN37)
RN4 "RESNET 4 x 100R" RESNET-1005X4 1804.73,3301.18 r270 bottom (schematic designator RN34)
RN5 "RESNET 4 x 100R" RESNET-1005X4 1701.39,4025.59 r270 bottom (schematic designator RN38)
RN6 "RESNET 4 x 100R" RESNET-1005X4 1508.47,3301.18 r270 bottom (schematic designator RN36)
TP1 "GND" TestPin 2875.71,3138.67 r0 top (schematic designator TP0)
TP2 "3V3" TestPin 2875.71,3038.67 r0 top (schematic designator TP1)
TP3 "2V5" TestPin 2875.71,2938.67 r0 top (schematic designator TP2)
TP4 "5V0" TestPin 2875.71,2838.67 r0 top (schematic designator TP3)
TP5 "1V2" TestPin 2875.71,2738.67 r0 top (schematic designator TP4)
U1 "DS2406" TSOC6 2712.59,2846.45 r90 bottom
U2 "SN74LVC1G04DBV" SOT95P280-5 1397.64,165.35 r0 bottom (schematic designator U1_SL)
U3 "S29GL256N11FFIV10" BGA100P8X8-64 2370.08,3036.42 r180 top locked (schematic designator U1)
U4 "XC3S1500-4FG676C" BGA100P26X26-676 1523.62,1472.44 r0 top locked (schematic designator U1)
U5 "MAX1831EEE" SOP63P602-16 2708.58,1720.75 r180 top locked (schematic designator U1_PS)
U6 "MAX8860EUA18+" SOP65P490-8 1826.77,2507.87 r0 top (schematic designator U11)
U7 "SDRAM-16Mx16" TSOP80P1176-54 1740.16,3677.16 r0 top (schematic designator U1)
U8 "SDRAM-16Mx16" TSOP80P1176-54 1740.16,3677.17 r180 bottom locked (schematic designator U2)
U9 "SRAM-256Kx16" TSOP80P1176-44 2612.3,1059.05 r90 top (schematic designator U1_SM)
U10 "SRAM-256Kx16" TSOP80P1176-44 2702.84,1059.04 r90 bottom (schematic designator U1_SM)
U11 "SRAM-256Kx16" TSOP80P1176-44 2602.36,3677.16 r0 top (schematic designator U1)
U12 "SRAM-256Kx16" TSOP80P1176-44 2665.35,3677.17 r180 bottom locked (schematic designator U2)

## Footprints (in the part's own frame and the unit in brackets; to place one, negate y for a bottom-side part, rotate by r counter-clockwise, add the part's x,y. Pads: shape width x height; smd on the part's side, far side on the other; paste and mask are expansions set on the pad)
54075 [mm]
  rect 0.5x1.9 smd: 1(-19.6,3.4) 2(-19.6,-3.4) 3(-18.8,3.4) 4(-18.8,-3.4) 5(-18,3.4) 6(-18,-3.4) 7(-17.2,3.4) 8(-17.2,-3.4) 9(-16.4,3.4) 10(-16.4,-3.4) 11(-15.6,3.4) 12(-15.6,-3.4) 13(-14.8,3.4) 14(-14.8,-3.4) 15(-14,3.4) 16(-14,-3.4) 17(-13.2,3.4) 18(-13.2,-3.4) 19(-12.4,3.4) 20(-12.4,-3.4) 21(-11.6,3.4) 22(-11.6,-3.4) 23(-10.8,3.4) 24(-10.8,-3.4) 25(-10,3.4) 26(-10,-3.4) 27(-9.2,3.4) 28(-9.2,-3.4) 29(-8.4,3.4) 30(-8.4,-3.4) 31(-7.6,3.4) 32(-7.6,-3.4) 33(-6.8,3.4) 34(-6.8,-3.4) 35(-6,3.4) 36(-6,-3.4) 37(-5.2,3.4) 38(-5.2,-3.4) 39(-4.4,3.4) 40(-4.4,-3.4) 41(-3.6,3.4) 42(-3.6,-3.4) 43(-2.8,3.4) 44(-2.8,-3.4) 45(-2,3.4) 46(-2,-3.4) 47(-1.2,3.4) 48(-1.2,-3.4) 49(-0.4,3.4) 50(-0.4,-3.4) 51(0.4,3.4) 52(0.4,-3.4) 53(1.2,3.4) 54(1.2,-3.4) 55(2,3.4) 56(2,-3.4) 57(2.8,3.4) 58(2.8,-3.4) 59(3.6,3.4) 60(3.6,-3.4) 61(4.4,3.4) 62(4.4,-3.4) 63(5.2,3.4) 64(5.2,-3.4) 65(6,3.4) 66(6,-3.4) 67(6.8,3.4) 68(6.8,-3.4) 69(7.6,3.4) 70(7.6,-3.4) 71(8.4,3.4) 72(8.4,-3.4) 73(9.2,3.4) 74(9.2,-3.4) 75(10,3.4) 76(10,-3.4) 77(10.8,3.4) 78(10.8,-3.4) 79(11.6,3.4) 80(11.6,-3.4) 81(12.4,3.4) 82(12.4,-3.4) 83(13.2,3.4) 84(13.2,-3.4) 85(14,3.4) 86(14,-3.4) 87(14.8,3.4) 88(14.8,-3.4) 89(15.6,3.4) 90(15.6,-3.4) 91(16.4,3.4) 92(16.4,-3.4) 93(17.2,3.4) 94(17.2,-3.4) 95(18,3.4) 96(18,-3.4) 97(18.8,3.4) 98(18.8,-3.4) 99(19.6,3.4) 100(19.6,-3.4)
  round 1.6 hole 0.7: MH1(-26.7,4.2) MH2(-25.9,-4.2) MH3(26.7,4.2) MH4(25.9,-4.2)
  round 4.8 hole 5.1 unplated: MH5(-26.3,0) MH6(26.3,0)
  Top Layer keep-out region: -20.15,2.15 20.15,2.15 20.15,-2.15 -20.15,-2.15
  silkscreen extent -30.35,-4.4 30.35,5.02, body extent -30.35,-4.4 30.35,4.4, height 3.6
BGA100P8X8-64 [mm] "AMD 64-Ball Fortfied Ball grid Array (FBGA)"
  round 0.5 smd: A1(-3.5,-3.5) A2(-3.5,-2.5) A3(-3.5,-1.5) A4(-3.5,-0.5) A5(-3.5,0.5) A6(-3.5,1.5) A7(-3.5,2.5) A8(-3.5,3.5) B1(-2.5,-3.5) B2(-2.5,-2.5) B3(-2.5,-1.5) B4(-2.5,-0.5) B5(-2.5,0.5) B6(-2.5,1.5) B7(-2.5,2.5) B8(-2.5,3.5) C1(-1.5,-3.5) C2(-1.5,-2.5) C3(-1.5,-1.5) C4(-1.5,-0.5) C5(-1.5,0.5) C6(-1.5,1.5) C7(-1.5,2.5) C8(-1.5,3.5) D1(-0.5,-3.5) D2(-0.5,-2.5) D3(-0.5,-1.5) D4(-0.5,-0.5) D5(-0.5,0.5) D6(-0.5,1.5) D7(-0.5,2.5) D8(-0.5,3.5) E1(0.5,-3.5) E2(0.5,-2.5) E3(0.5,-1.5) E4(0.5,-0.5) E5(0.5,0.5) E6(0.5,1.5) E7(0.5,2.5) E8(0.5,3.5) F1(1.5,-3.5) F2(1.5,-2.5) F3(1.5,-1.5) F4(1.5,-0.5) F5(1.5,0.5) F6(1.5,1.5) F7(1.5,2.5) F8(1.5,3.5) G1(2.5,-3.5) G2(2.5,-2.5) G3(2.5,-1.5) G4(2.5,-0.5) G5(2.5,0.5) G6(2.5,1.5) G7(2.5,2.5) G8(2.5,3.5) H1(3.5,-3.5) H2(3.5,-2.5) H3(3.5,-1.5) H4(3.5,-0.5) H5(3.5,0.5) H6(3.5,1.5) H7(3.5,2.5) H8(3.5,3.5)
  silkscreen extent -6.5,-6.32 6.5,5.5, body extent -6.35,-5.4 6.41,5.36, height 1
BGA100P26X26-676 [mm]
  round 0.5 smd: A1(-12.5,12.5) A2(-11.5,12.5) A3(-10.5,12.5) A4(-9.5,12.5) A5(-8.5,12.5) A6(-7.5,12.5) A7(-6.5,12.5) A8(-5.5,12.5) A9(-4.5,12.5) A10(-3.5,12.5) A11(-2.5,12.5) A12(-1.5,12.5) A13(-0.5,12.5) A14(0.5,12.5) A15(1.5,12.5) A16(2.5,12.5) A17(3.5,12.5) A18(4.5,12.5) A19(5.5,12.5) A20(6.5,12.5) A21(7.5,12.5) A22(8.5,12.5) A23(9.5,12.5) A24(10.5,12.5) A25(11.5,12.5) A26(12.5,12.5) AA1(-12.5,-7.5) AA2(-11.5,-7.5) AA3(-10.5,-7.5) AA4(-9.5,-7.5) AA5(-8.5,-7.5) AA6(-7.5,-7.5) AA7(-6.5,-7.5) AA8(-5.5,-7.5) AA9(-4.5,-7.5) AA10(-3.5,-7.5) AA11(-2.5,-7.5) AA12(-1.5,-7.5) AA13(-0.5,-7.5) AA14(0.5,-7.5) AA15(1.5,-7.5) AA16(2.5,-7.5) AA17(3.5,-7.5) AA18(4.5,-7.5) AA19(5.5,-7.5) AA20(6.5,-7.5) AA21(7.5,-7.5) AA22(8.5,-7.5) AA23(9.5,-7.5) AA24(10.5,-7.5) AA25(11.5,-7.5) AA26(12.5,-7.5) AB1(-12.5,-8.5) AB2(-11.5,-8.5) AB3(-10.5,-8.5) AB4(-9.5,-8.5) AB5(-8.5,-8.5) AB6(-7.5,-8.5) AB7(-6.5,-8.5) AB8(-5.5,-8.5) AB9(-4.5,-8.5) AB10(-3.5,-8.5) AB11(-2.5,-8.5) AB12(-1.5,-8.5) AB13(-0.5,-8.5) AB14(0.5,-8.5) AB15(1.5,-8.5) AB16(2.5,-8.5) AB17(3.5,-8.5) AB18(4.5,-8.5) AB19(5.5,-8.5) AB20(6.5,-8.5) AB21(7.5,-8.5) AB22(8.5,-8.5) AB23(9.5,-8.5) AB24(10.5,-8.5) AB25(11.5,-8.5) AB26(12.5,-8.5) AC1(-12.5,-9.5) AC2(-11.5,-9.5) AC3(-10.5,-9.5) AC4(-9.5,-9.5) AC5(-8.5,-9.5) AC6(-7.5,-9.5) AC7(-6.5,-9.5) AC8(-5.5,-9.5) AC9(-4.5,-9.5) AC10(-3.5,-9.5) AC11(-2.5,-9.5) AC12(-1.5,-9.5) AC13(-0.5,-9.5) AC14(0.5,-9.5) AC15(1.5,-9.5) AC16(2.5,-9.5) AC17(3.5,-9.5) AC18(4.5,-9.5) AC19(5.5,-9.5) AC20(6.5,-9.5) AC21(7.5,-9.5) AC22(8.5,-9.5) AC23(9.5,-9.5) AC24(10.5,-9.5) AC25(11.5,-9.5) AC26(12.5,-9.5) AD1(-12.5,-10.5) AD2(-11.5,-10.5) AD3(-10.5,-10.5) AD4(-9.5,-10.5) AD5(-8.5,-10.5) AD6(-7.5,-10.5) AD7(-6.5,-10.5) AD8(-5.5,-10.5) AD9(-4.5,-10.5) AD10(-3.5,-10.5) AD11(-2.5,-10.5) AD12(-1.5,-10.5) AD13(-0.5,-10.5) AD14(0.5,-10.5) AD15(1.5,-10.5) AD16(2.5,-10.5) AD17(3.5,-10.5) AD18(4.5,-10.5) AD19(5.5,-10.5) AD20(6.5,-10.5) AD21(7.5,-10.5) AD22(8.5,-10.5) AD23(9.5,-10.5) AD24(10.5,-10.5) AD25(11.5,-10.5) AD26(12.5,-10.5) AE1(-12.5,-11.5) AE2(-11.5,-11.5) AE3(-10.5,-11.5) AE4(-9.5,-11.5) AE5(-8.5,-11.5) AE6(-7.5,-11.5) AE7(-6.5,-11.5) AE8(-5.5,-11.5) AE9(-4.5,-11.5) AE10(-3.5,-11.5) AE11(-2.5,-11.5) AE12(-1.5,-11.5) AE13(-0.5,-11.5) AE14(0.5,-11.5) AE15(1.5,-11.5) AE16(2.5,-11.5) AE17(3.5,-11.5) AE18(4.5,-11.5) AE19(5.5,-11.5) AE20(6.5,-11.5) AE21(7.5,-11.5) AE22(8.5,-11.5) AE23(9.5,-11.5) AE24(10.5,-11.5) AE25(11.5,-11.5) AE26(12.5,-11.5) AF1(-12.5,-12.5) AF2(-11.5,-12.5) AF3(-10.5,-12.5) AF4(-9.5,-12.5) AF5(-8.5,-12.5) AF6(-7.5,-12.5) AF7(-6.5,-12.5) AF8(-5.5,-12.5) AF9(-4.5,-12.5) AF10(-3.5,-12.5) AF11(-2.5,-12.5) AF12(-1.5,-12.5) AF13(-0.5,-12.5) AF14(0.5,-12.5) AF15(1.5,-12.5) AF16(2.5,-12.5) AF17(3.5,-12.5) AF18(4.5,-12.5) AF19(5.5,-12.5) AF20(6.5,-12.5) AF21(7.5,-12.5) AF22(8.5,-12.5) AF23(9.5,-12.5) AF24(10.5,-12.5) AF25(11.5,-12.5) AF26(12.5,-12.5) B1(-12.5,11.5) B2(-11.5,11.5) B3(-10.5,11.5) B4(-9.5,11.5) B5(-8.5,11.5) B6(-7.5,11.5) B7(-6.5,11.5) B8(-5.5,11.5) B9(-4.5,11.5) B10(-3.5,11.5) B11(-2.5,11.5) B12(-1.5,11.5) B13(-0.5,11.5) B14(0.5,11.5) B15(1.5,11.5) B16(2.5,11.5) B17(3.5,11.5) B18(4.5,11.5) B19(5.5,11.5) B20(6.5,11.5) B21(7.5,11.5) B22(8.5,11.5) B23(9.5,11.5) B24(10.5,11.5) B25(11.5,11.5) B26(12.5,11.5) C1(-12.5,10.5) C2(-11.5,10.5) C3(-10.5,10.5) C4(-9.5,10.5) C5(-8.5,10.5) C6(-7.5,10.5) C7(-6.5,10.5) C8(-5.5,10.5) C9(-4.5,10.5) C10(-3.5,10.5) C11(-2.5,10.5) C12(-1.5,10.5) C13(-0.5,10.5) C14(0.5,10.5) C15(1.5,10.5) C16(2.5,10.5) C17(3.5,10.5) C18(4.5,10.5) C19(5.5,10.5) C20(6.5,10.5) C21(7.5,10.5) C22(8.5,10.5) C23(9.5,10.5) C24(10.5,10.5) C25(11.5,10.5) C26(12.5,10.5) D1(-12.5,9.5) D2(-11.5,9.5) D3(-10.5,9.5) D4(-9.5,9.5) D5(-8.5,9.5) D6(-7.5,9.5) D7(-6.5,9.5) D8(-5.5,9.5) D9(-4.5,9.5) D10(-3.5,9.5) D11(-2.5,9.5) D12(-1.5,9.5) D13(-0.5,9.5) D14(0.5,9.5) D15(1.5,9.5) D16(2.5,9.5) D17(3.5,9.5) D18(4.5,9.5) D19(5.5,9.5) D20(6.5,9.5) D21(7.5,9.5) D22(8.5,9.5) D23(9.5,9.5) D24(10.5,9.5) D25(11.5,9.5) D26(12.5,9.5) E1(-12.5,8.5) E2(-11.5,8.5) E3(-10.5,8.5) E4(-9.5,8.5) E5(-8.5,8.5) E6(-7.5,8.5) E7(-6.5,8.5) E8(-5.5,8.5) E9(-4.5,8.5) E10(-3.5,8.5) E11(-2.5,8.5) E12(-1.5,8.5) E13(-0.5,8.5) E14(0.5,8.5) E15(1.5,8.5) E16(2.5,8.5) E17(3.5,8.5) E18(4.5,8.5) E19(5.5,8.5) E20(6.5,8.5) E21(7.5,8.5) E22(8.5,8.5) E23(9.5,8.5) E24(10.5,8.5) E25(11.5,8.5) E26(12.5,8.5) F1(-12.5,7.5) F2(-11.5,7.5) F3(-10.5,7.5) F4(-9.5,7.5) F5(-8.5,7.5) F6(-7.5,7.5) F7(-6.5,7.5) F8(-5.5,7.5) F9(-4.5,7.5) F10(-3.5,7.5) F11(-2.5,7.5) F12(-1.5,7.5) F13(-0.5,7.5) F14(0.5,7.5) F15(1.5,7.5) F16(2.5,7.5) F17(3.5,7.5) F18(4.5,7.5) F19(5.5,7.5) F20(6.5,7.5) F21(7.5,7.5) F22(8.5,7.5) F23(9.5,7.5) F24(10.5,7.5) F25(11.5,7.5) F26(12.5,7.5) G1(-12.5,6.5) G2(-11.5,6.5) G3(-10.5,6.5) G4(-9.5,6.5) G5(-8.5,6.5) G6(-7.5,6.5) G7(-6.5,6.5) G8(-5.5,6.5) G9(-4.5,6.5) G10(-3.5,6.5) G11(-2.5,6.5) G12(-1.5,6.5) G13(-0.5,6.5) G14(0.5,6.5) G15(1.5,6.5) G16(2.5,6.5) G17(3.5,6.5) G18(4.5,6.5) G19(5.5,6.5) G20(6.5,6.5) G21(7.5,6.5) G22(8.5,6.5) G23(9.5,6.5) G24(10.5,6.5) G25(11.5,6.5) G26(12.5,6.5) H1(-12.5,5.5) H2(-11.5,5.5) H3(-10.5,5.5) H4(-9.5,5.5) H5(-8.5,5.5) H6(-7.5,5.5) H7(-6.5,5.5) H8(-5.5,5.5) H9(-4.5,5.5) H10(-3.5,5.5) H11(-2.5,5.5) H12(-1.5,5.5) H13(-0.5,5.5) H14(0.5,5.5) H15(1.5,5.5) H16(2.5,5.5) H17(3.5,5.5) H18(4.5,5.5) H19(5.5,5.5) H20(6.5,5.5) H21(7.5,5.5) H22(8.5,5.5) H23(9.5,5.5) H24(10.5,5.5) H25(11.5,5.5) H26(12.5,5.5) J1(-12.5,4.5) J2(-11.5,4.5) J3(-10.5,4.5) J4(-9.5,4.5) J5(-8.5,4.5) J6(-7.5,4.5) J7(-6.5,4.5) J8(-5.5,4.5) J9(-4.5,4.5) J10(-3.5,4.5) J11(-2.5,4.5) J12(-1.5,4.5) J13(-0.5,4.5) J14(0.5,4.5) J15(1.5,4.5) J16(2.5,4.5) J17(3.5,4.5) J18(4.5,4.5) J19(5.5,4.5) J20(6.5,4.5) J21(7.5,4.5) J22(8.5,4.5) J23(9.5,4.5) J24(10.5,4.5) J25(11.5,4.5) J26(12.5,4.5) K1(-12.5,3.5) K2(-11.5,3.5) K3(-10.5,3.5) K4(-9.5,3.5) K5(-8.5,3.5) K6(-7.5,3.5) K7(-6.5,3.5) K8(-5.5,3.5) K9(-4.5,3.5) K10(-3.5,3.5) K11(-2.5,3.5) K12(-1.5,3.5) K13(-0.5,3.5) K14(0.5,3.5) K15(1.5,3.5) K16(2.5,3.5) K17(3.5,3.5) K18(4.5,3.5) K19(5.5,3.5) K20(6.5,3.5) K21(7.5,3.5) K22(8.5,3.5) K23(9.5,3.5) K24(10.5,3.5) K25(11.5,3.5) K26(12.5,3.5) L1(-12.5,2.5) L2(-11.5,2.5) L3(-10.5,2.5) L4(-9.5,2.5) L5(-8.5,2.5) L6(-7.5,2.5) L7(-6.5,2.5) L8(-5.5,2.5) L9(-4.5,2.5) L10(-3.5,2.5) L11(-2.5,2.5) L12(-1.5,2.5) L13(-0.5,2.5) L14(0.5,2.5) L15(1.5,2.5) L16(2.5,2.5) L17(3.5,2.5) L18(4.5,2.5) L19(5.5,2.5) L20(6.5,2.5) L21(7.5,2.5) L22(8.5,2.5) L23(9.5,2.5) L24(10.5,2.5) L25(11.5,2.5) L26(12.5,2.5) M1(-12.5,1.5) M2(-11.5,1.5) M3(-10.5,1.5) M4(-9.5,1.5) M5(-8.5,1.5) M6(-7.5,1.5) M7(-6.5,1.5) M8(-5.5,1.5) M9(-4.5,1.5) M10(-3.5,1.5) M11(-2.5,1.5) M12(-1.5,1.5) M13(-0.5,1.5) M14(0.5,1.5) M15(1.5,1.5) M16(2.5,1.5) M17(3.5,1.5) M18(4.5,1.5) M19(5.5,1.5) M20(6.5,1.5) M21(7.5,1.5) M22(8.5,1.5) M23(9.5,1.5) M24(10.5,1.5) M25(11.5,1.5) M26(12.5,1.5) N1(-12.5,0.5) N2(-11.5,0.5) N3(-10.5,0.5) N4(-9.5,0.5) N5(-8.5,0.5) N6(-7.5,0.5) N7(-6.5,0.5) N8(-5.5,0.5) N9(-4.5,0.5) N10(-3.5,0.5) N11(-2.5,0.5) N12(-1.5,0.5) N13(-0.5,0.5) N14(0.5,0.5) N15(1.5,0.5) N16(2.5,0.5) N17(3.5,0.5) N18(4.5,0.5) N19(5.5,0.5) N20(6.5,0.5) N21(7.5,0.5) N22(8.5,0.5) N23(9.5,0.5) N24(10.5,0.5) N25(11.5,0.5) N26(12.5,0.5) P1(-12.5,-0.5) P2(-11.5,-0.5) P3(-10.5,-0.5) P4(-9.5,-0.5) P5(-8.5,-0.5) P6(-7.5,-0.5) P7(-6.5,-0.5) P8(-5.5,-0.5) P9(-4.5,-0.5) P10(-3.5,-0.5) P11(-2.5,-0.5) P12(-1.5,-0.5) P13(-0.5,-0.5) P14(0.5,-0.5) P15(1.5,-0.5) P16(2.5,-0.5) P17(3.5,-0.5) P18(4.5,-0.5) P19(5.5,-0.5) P20(6.5,-0.5) P21(7.5,-0.5) P22(8.5,-0.5) P23(9.5,-0.5) P24(10.5,-0.5) P25(11.5,-0.5) P26(12.5,-0.5) R1(-12.5,-1.5) R2(-11.5,-1.5) R3(-10.5,-1.5) R4(-9.5,-1.5) R5(-8.5,-1.5) R6(-7.5,-1.5) R7(-6.5,-1.5) R8(-5.5,-1.5) R9(-4.5,-1.5) R10(-3.5,-1.5) R11(-2.5,-1.5) R12(-1.5,-1.5) R13(-0.5,-1.5) R14(0.5,-1.5) R15(1.5,-1.5) R16(2.5,-1.5) R17(3.5,-1.5) R18(4.5,-1.5) R19(5.5,-1.5) R20(6.5,-1.5) R21(7.5,-1.5) R22(8.5,-1.5) R23(9.5,-1.5) R24(10.5,-1.5) R25(11.5,-1.5) R26(12.5,-1.5) T1(-12.5,-2.5) T2(-11.5,-2.5) T3(-10.5,-2.5) T4(-9.5,-2.5) T5(-8.5,-2.5) T6(-7.5,-2.5) T7(-6.5,-2.5) T8(-5.5,-2.5) T9(-4.5,-2.5) T10(-3.5,-2.5) T11(-2.5,-2.5) T12(-1.5,-2.5) T13(-0.5,-2.5) T14(0.5,-2.5) T15(1.5,-2.5) T16(2.5,-2.5) T17(3.5,-2.5) T18(4.5,-2.5) T19(5.5,-2.5) T20(6.5,-2.5) T21(7.5,-2.5) T22(8.5,-2.5) T23(9.5,-2.5) T24(10.5,-2.5) T25(11.5,-2.5) T26(12.5,-2.5) U1(-12.5,-3.5) U2(-11.5,-3.5) U3(-10.5,-3.5) U4(-9.5,-3.5) U5(-8.5,-3.5) U6(-7.5,-3.5) U7(-6.5,-3.5) U8(-5.5,-3.5) U9(-4.5,-3.5) U10(-3.5,-3.5) U11(-2.5,-3.5) U12(-1.5,-3.5) U13(-0.5,-3.5) U14(0.5,-3.5) U15(1.5,-3.5) U16(2.5,-3.5) U17(3.5,-3.5) U18(4.5,-3.5) U19(5.5,-3.5) U20(6.5,-3.5) U21(7.5,-3.5) U22(8.5,-3.5) U23(9.5,-3.5) U24(10.5,-3.5) U25(11.5,-3.5) U26(12.5,-3.5) V1(-12.5,-4.5) V2(-11.5,-4.5) V3(-10.5,-4.5) V4(-9.5,-4.5) V5(-8.5,-4.5) V6(-7.5,-4.5) V7(-6.5,-4.5) V8(-5.5,-4.5) V9(-4.5,-4.5) V10(-3.5,-4.5) V11(-2.5,-4.5) V12(-1.5,-4.5) V13(-0.5,-4.5) V14(0.5,-4.5) V15(1.5,-4.5) V16(2.5,-4.5) V17(3.5,-4.5) V18(4.5,-4.5) V19(5.5,-4.5) V20(6.5,-4.5) V21(7.5,-4.5) V22(8.5,-4.5) V23(9.5,-4.5) V24(10.5,-4.5) V25(11.5,-4.5) V26(12.5,-4.5) W1(-12.5,-5.5) W2(-11.5,-5.5) W3(-10.5,-5.5) W4(-9.5,-5.5) W5(-8.5,-5.5) W6(-7.5,-5.5) W7(-6.5,-5.5) W8(-5.5,-5.5) W9(-4.5,-5.5) W10(-3.5,-5.5) W11(-2.5,-5.5) W12(-1.5,-5.5) W13(-0.5,-5.5) W14(0.5,-5.5) W15(1.5,-5.5) W16(2.5,-5.5) W17(3.5,-5.5) W18(4.5,-5.5) W19(5.5,-5.5) W20(6.5,-5.5) W21(7.5,-5.5) W22(8.5,-5.5) W23(9.5,-5.5) W24(10.5,-5.5) W25(11.5,-5.5) W26(12.5,-5.5) Y1(-12.5,-6.5) Y2(-11.5,-6.5) Y3(-10.5,-6.5) Y4(-9.5,-6.5) Y5(-8.5,-6.5) Y6(-7.5,-6.5) Y7(-6.5,-6.5) Y8(-5.5,-6.5) Y9(-4.5,-6.5) Y10(-3.5,-6.5) Y11(-2.5,-6.5) Y12(-1.5,-6.5) Y13(-0.5,-6.5) Y14(0.5,-6.5) Y15(1.5,-6.5) Y16(2.5,-6.5) Y17(3.5,-6.5) Y18(4.5,-6.5) Y19(5.5,-6.5) Y20(6.5,-6.5) Y21(7.5,-6.5) Y22(8.5,-6.5) Y23(9.5,-6.5) Y24(10.5,-6.5) Y25(11.5,-6.5) Y26(12.5,-6.5)
  round 1 on Mech7 paste-0.55 mask+1: FID1(-15,15) FID1(15,-15)
  round 1 smd paste-0.55 mask+0.762: FID1(-15,15) FID1(15,-15)
  Top Layer keep-out circle w0.2: c15,-15 r1
  Top Layer keep-out circle w0.2: c-15,15 r1
  silkscreen extent -14.77,-13.5 13.5,13.5, body extent -13.55,-13.45 13.45,13.55, height 2.6
CAPC1005-STAR#1 [mm] "Chip Capacitor 1005"
  rect 0.6x0.6 smd: 1(-0.525,0) 2(0.525,0)
  silkscreen extent -0.05,-0.38 0.05,0.38, body extent -0.57,-0.3 0.57,0.3, height 0.2
CAPC1005-STAR#2 [mm] "Chip Capacitor 1005"
  rect 0.6x0.6 smd mask+0.025: 1(-0.525,0)
  rect 0.6x0.6 smd: 2(0.525,0)
  silkscreen extent -0.05,-0.38 0.05,0.38, body extent -0.57,-0.3 0.57,0.3, height 0.2
CAPC1608-STAR [mm] "Capacitor SMD 0603 (1608)"
  rect 0.9x0.8 smd: 1(-0.8,0) 2(0.8,0)
  silkscreen extent 0,-0.4 0,0.4, body extent -1.07,-0.3 1.12,0.3, height 0.8
CAPC2012-STAR [mm] "0805 Capacitor SMD - Startronics"
  rect 1x1.25 smd: 1(-1,0) 2(1,0)
  silkscreen extent -0.4,-1 0.4,1, body extent -1.32,-0.69 1.23,0.67, height 0.5
CAPC3216-STAR [mm] "Capacitor 1206 (3216) for Startronics"
  rect 1x1.6 smd: 1(-1.45,0) 2(1.45,0)
  silkscreen extent -0.62,-1.1 0.62,1.1, body extent -1.64,-0.89 1.63,0.86, height 0.9
CAPC3225-STAR [mm] "1210 Capacitor SMD - Startronics"
  rect 1x2.75 smd: 1(-1.5,0) 2(1.5,0)
  silkscreen extent -0.7,-1.5 0.7,1.5, body extent -1.94,-1.2 1.89,1.29, height 1.5
CAPC7343-STAR [mm] "Capcacitor SMD 7.3 x 4.3mm (D-Case)"
  rect 2.6x2.4 smd: 1(-3.202,0.007) 2(3.198,0.007)
  silkscreen extent -5.32,-2.39 5.08,2.41, body extent -3.5,-2.03 3.51,2.04, height 1.75
IND-EPCOS-SMD-B82559 [mm]
  rect 4.4x10.4 smd: 1(0,0) 2(8.4,0)
  silkscreen extent -2.5,-5.5 11,5.5
LEAD_FREE_S [mil]
  silkscreen extent -125,-125 125,125
LED2012-STAR [mm] "0805 LED SMD - Startronics"
  rect 1x1.25 smd: 1(1,0) 2(-1,0)
  silkscreen extent -2.27,-1 1.8,1, body extent -1.6,-0.6 1.5,0.6, height 0.67
Logo-Altium [mil]
  silkscreen extent -1025,-99 -556,102
MOUNTING_HOLE_3MM [mm] "Non-plated mounting hole for 3mm screw"
  round 3.8 hole 3.4 mask+0.2: MOUNT(0,0)
  Top Layer circle w1: c0,0 r2.3
  Top Layer region: -2.8,-2.8 2.8,-2.8 2.8,2.8 -2.8,2.8
  Top Layer keep-out region: -3.3,-3.3 3.3,-3.3 3.3,3.3 -3.3,3.3
  Bottom Layer region: -2.8,-2.8 2.8,-2.8 2.8,2.8 -2.8,2.8
  Bottom Layer keep-out region: -3.3,-3.3 3.3,-3.3 3.3,3.3 -3.3,3.3
  Keep-Out Layer circle w1.2: c0,0 r2.5
NETTIE-SMT2-8X8 [mm]
  rect 0.4x0.2 smd paste-0.11 mask-0.11: 1(-0.891,-0.006) 2(-0.691,-0.006)
RESC1005-STAR [mm] "Chip Inductor 1005"
  rect 0.575x0.6 smd: 1(-0.538,0) 2(0.538,0)
  silkscreen extent -0.05,-0.38 0.05,0.38, body extent -0.71,-0.25 0.72,0.26, height 0.25
RESNET-1005X4 [mm] "Resistor network 4 x 1005 (0402)"
  rect 0.3x0.83 smd: 1(-0.75,-0.64) 2(-0.25,-0.64) 3(0.25,-0.64) 4(0.75,-0.64) 5(0.75,0.64) 6(0.25,0.64) 7(-0.25,0.64) 8(-0.75,0.64)
  silkscreen extent -1.15,-1 1.15,1, body extent -0.92,-0.84 1.04,0.81, height 0.4
SOP63P602-16 [mil]
  rect 82x16 smd: 1(-116,87.5) 2(-116,62) 3(-116,37.5) 4(-116,12.5) 5(-116,-12.5) 6(-116,-37.5) 7(-116,-62.5) 8(-116,-87.5) 9(116,-87.5) 10(116,-62.5) 11(116,-37.5) 12(116,-12.5) 13(116,12.5) 14(116,37.5) 15(116,62.5) 16(116,87.5)
  silkscreen extent -100,-100 60,125, body extent -107,-100 108,103, height 29
SOP65P490-8 [mm]
  rect 1.5x0.35 smd: 1(-2.275,0.975) 2(-2.3,0.325) 3(-2.3,-0.325) 4(-2.3,-0.975) 5(2.275,-0.975) 6(2.275,-0.325) 7(2.3,0.325) 8(2.3,0.975)
  silkscreen extent -2.38,-1.3 1.3,1.75, body extent -2.39,-1.23 2.41,1.28, height 1
SOT95P280-5 [mm] "SOT-23/SC-74A; 5 Leads; Body 3.1 x 3 mm, inc. leads (LxW max)"
  rect 0.6x1.3 smd: 1(-0.95,-1.4) 2(0,-1.4) 3(0.95,-1.4) 4(0.95,1.4)
  rect 0.6x1.25 smd: 5(-0.95,1.4)
  silkscreen extent -1.55,-0.9 1.55,0.9, body extent -1.51,-1.49 1.52,1.52, height 0.8
TestPin [mil]
  round 60 hole 35.43: 1(0,0)
  silkscreen extent -41,-39 156,39
TSOC6 [mil]
  rect 25x71 smd: 1(-50,-75) 2(0,-75) 3(50,-75) 4(50,75) 5(0,75) 6(-50,75)
  silkscreen extent -115,-80 85,80, body extent -79,-90 84,91, height 40
TSOP80P1176-44 [mm]
  rect 0.5x1.4 smd: 1(-8.4,-5.7) 2(-7.6,-5.7) 3(-6.8,-5.7) 4(-6,-5.7) 5(-5.2,-5.7) 6(-4.4,-5.7) 7(-3.6,-5.7) 8(-2.8,-5.7) 9(-2,-5.7) 10(-1.2,-5.7) 11(-0.4,-5.7) 12(0.4,-5.7) 13(1.2,-5.7) 14(2,-5.7) 15(2.8,-5.7) 16(3.6,-5.7) 17(4.4,-5.7) 18(5.2,-5.7) 19(6,-5.7) 20(6.8,-5.7) 21(7.6,-5.7) 22(8.4,-5.7) 23(8.4,5.7) 24(7.6,5.7) 25(6.8,5.7) 26(6,5.7) 27(5.2,5.7) 28(4.4,5.7) 29(3.6,5.7) 30(2.8,5.7) 31(2,5.7) 32(1.2,5.7) 33(0.4,5.7) 34(-0.4,5.7) 35(-1.2,5.7) 36(-2,5.7) 37(-2.8,5.7) 38(-3.6,5.7) 39(-4.4,5.7) 40(-5.2,5.7) 41(-6,5.7) 42(-6.8,5.7) 43(-7.6,5.7) 44(-8.4,5.7)
  silkscreen extent -9.29,-5.7 9.26,4.45, body extent -9.24,-5.95 9.26,5.84, height 1
TSOP80P1176-54 [mm] "Plastic Small Outline; 54 Leads; Body Width 10.16 mm"
  rect 0.5x1.4 smd: 1(-10.4,-5.7) 2(-9.6,-5.7) 3(-8.8,-5.7) 4(-8,-5.7) 5(-7.2,-5.7) 6(-6.4,-5.7) 7(-5.6,-5.7) 8(-4.8,-5.7) 9(-4,-5.7) 10(-3.2,-5.7) 11(-2.4,-5.7) 12(-1.6,-5.7) 13(-0.8,-5.7) 14(0,-5.7) 15(0.8,-5.7) 16(1.6,-5.7) 17(2.4,-5.7) 18(3.2,-5.7) 19(4,-5.7) 20(4.8,-5.7) 21(5.6,-5.7) 22(6.4,-5.7) 23(7.2,-5.7) 24(8,-5.7) 25(8.8,-5.7) 26(9.6,-5.7) 27(10.4,-5.7) 28(10.4,5.7) 29(9.6,5.7) 30(8.8,5.7) 31(8,5.7) 32(7.2,5.7) 33(6.4,5.7) 34(5.6,5.7) 35(4.8,5.7) 36(4,5.7) 37(3.2,5.7) 38(2.4,5.7) 39(1.6,5.7) 40(0.8,5.7) 41(0,5.7) 42(-0.8,5.7) 43(-1.6,5.7) 44(-2.4,5.7) 45(-3.2,5.7) 46(-4,5.7) 47(-4.8,5.7) 48(-5.6,5.7) 49(-6.4,5.7) 50(-7.2,5.7) 51(-8,5.7) 52(-8.8,5.7) 53(-9.6,5.7) 54(-10.4,5.7)
  silkscreen extent -11.33,-5.67 11.15,4.4, body extent -11.23,-5.96 11.19,5.97, height 1